# Altium PCB RT_SUPER_C1.PCBdoc (part 1 of 3)
Units mil, origin at the board's own origin, x right, y up, seen from the top; angles counter-clockwise.
Board outline 1450 x 1450 mil, 6 copper layers (Top Layer, GND2, PWR3, PWR4, GND5, Bottom Layer), stack 39.512 mil thick; 158 components, 116 nets, 476 pads, 207 vias.
Unrouted connection lines stored in the file: 5.
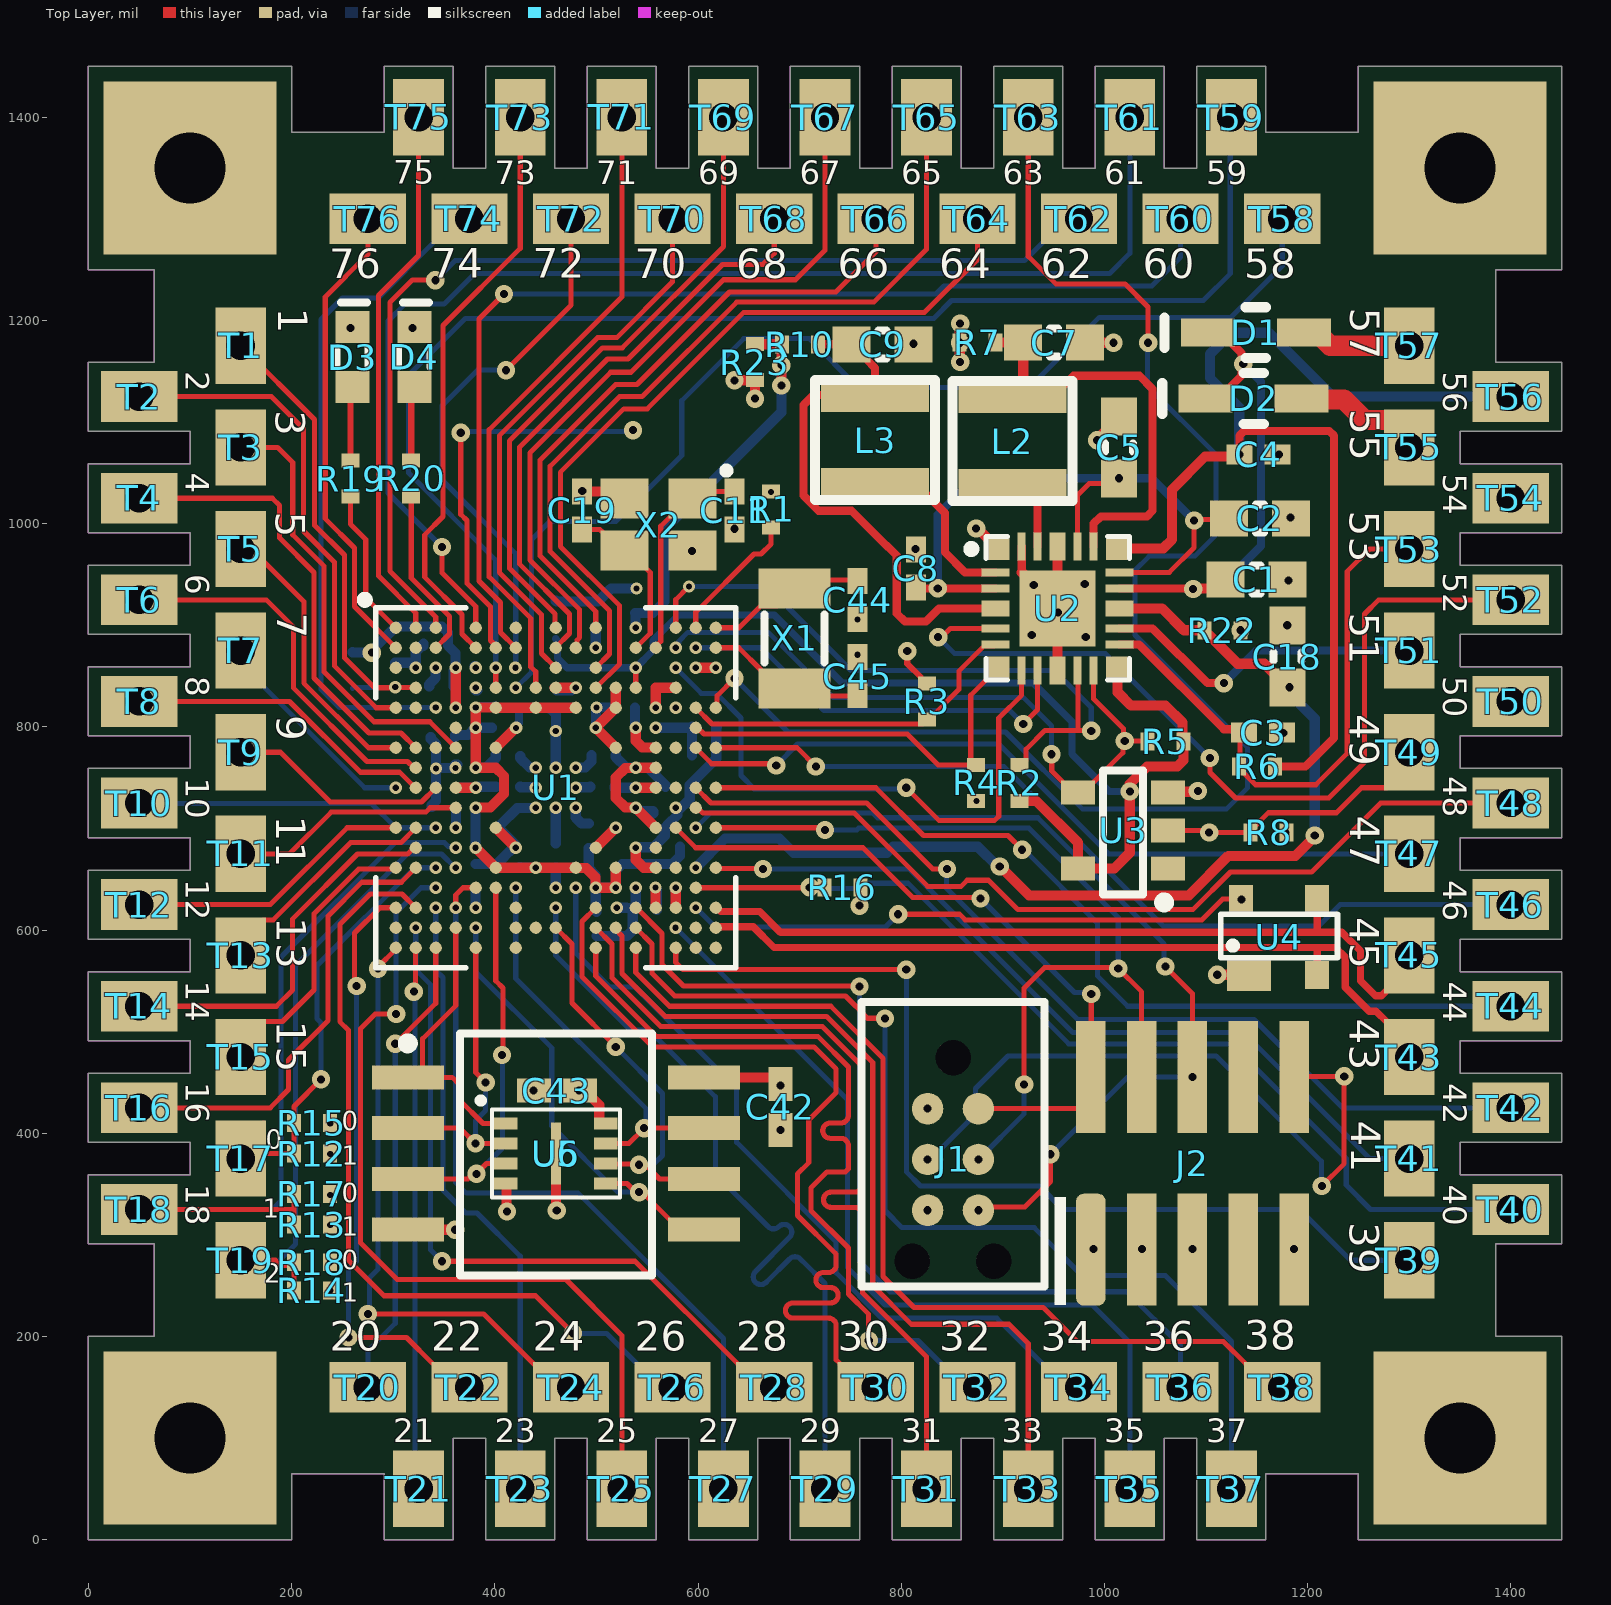
[diagram p0: Top Layer view]
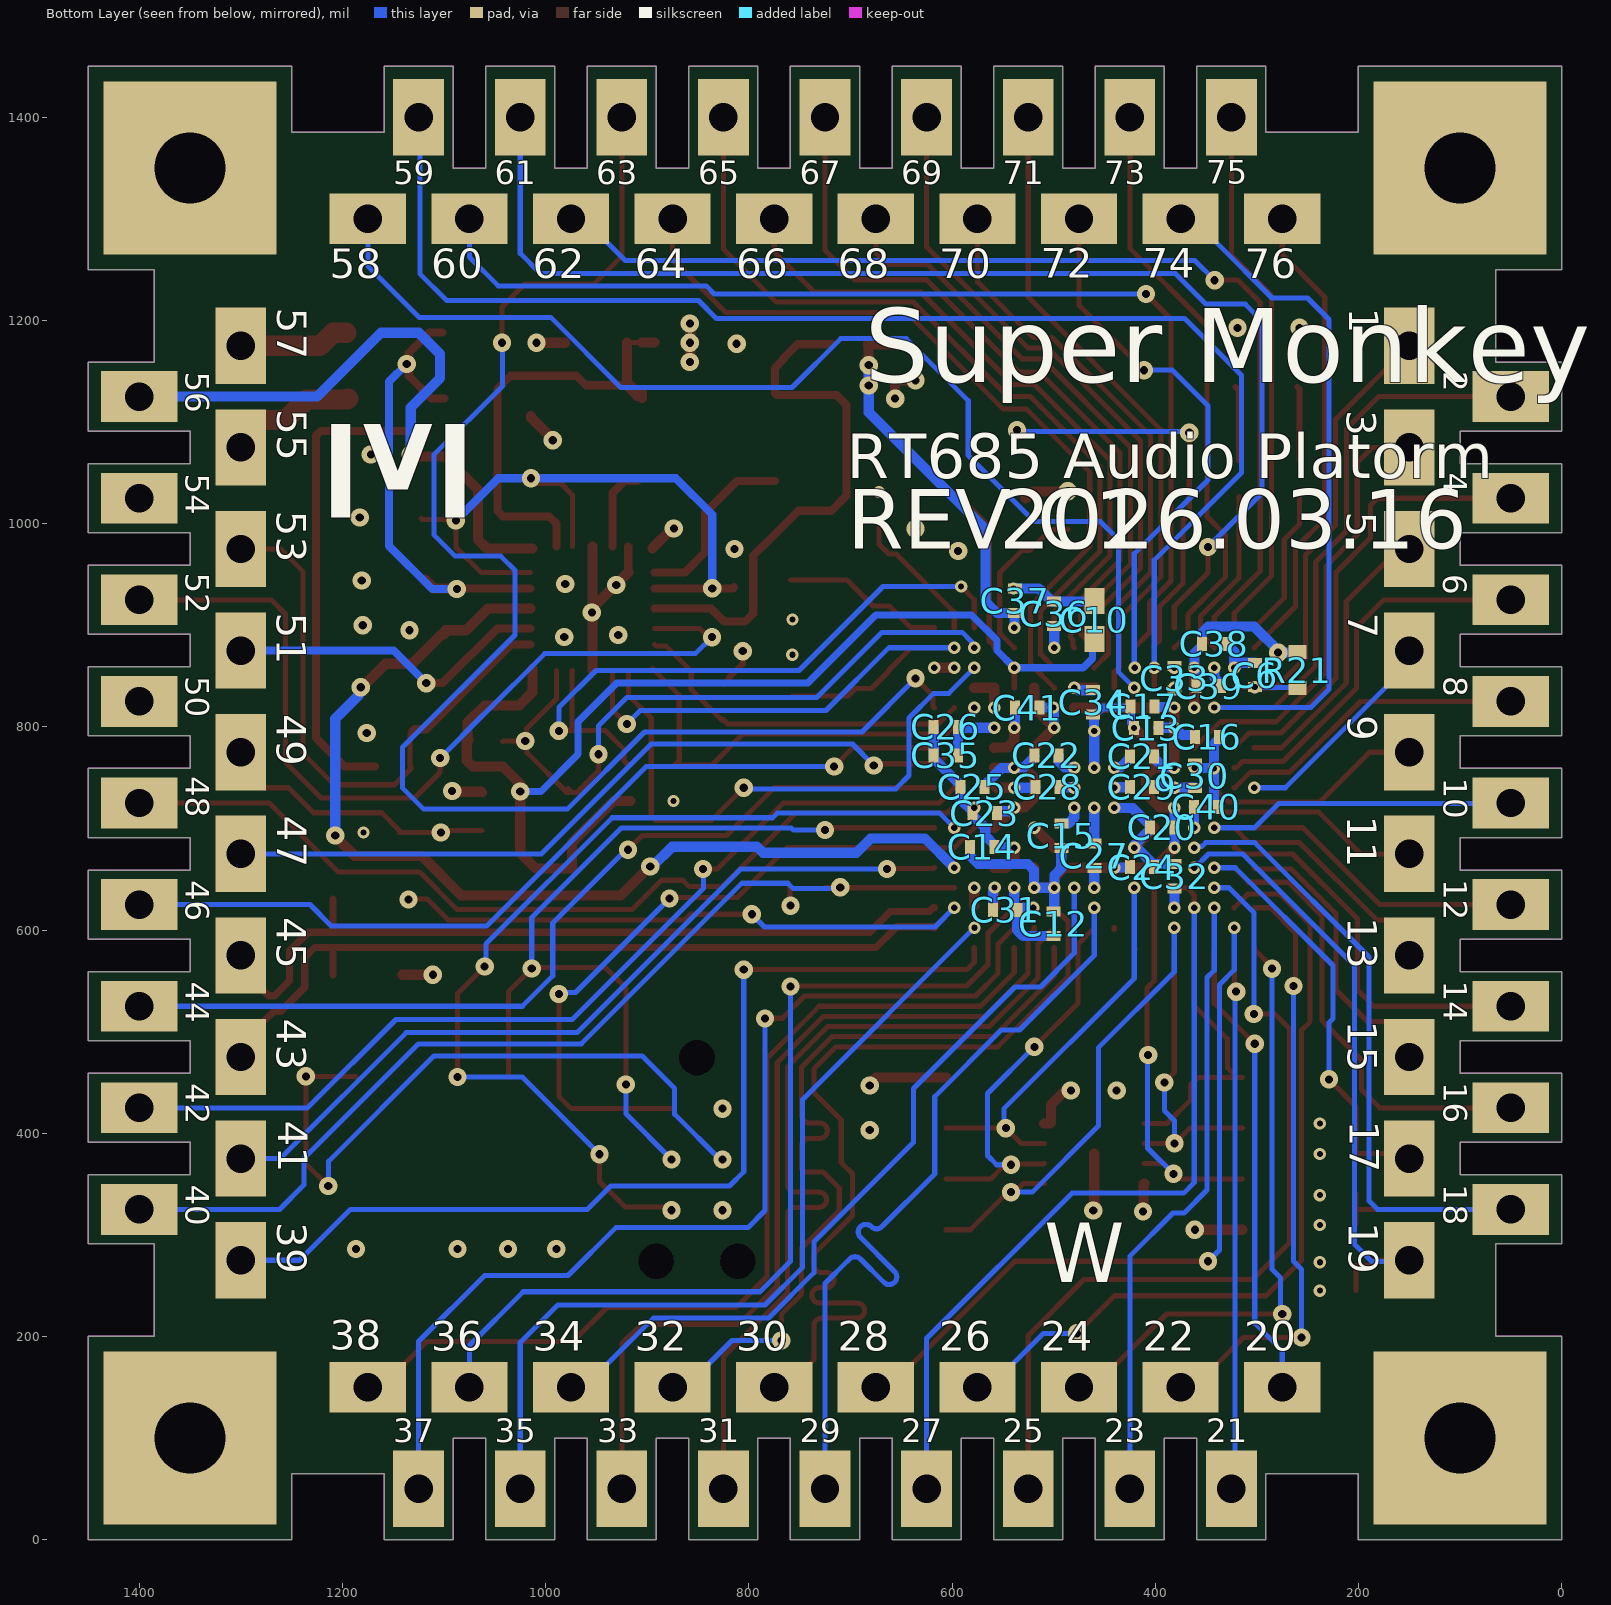
[diagram p1: Bottom Layer view, seen from below]
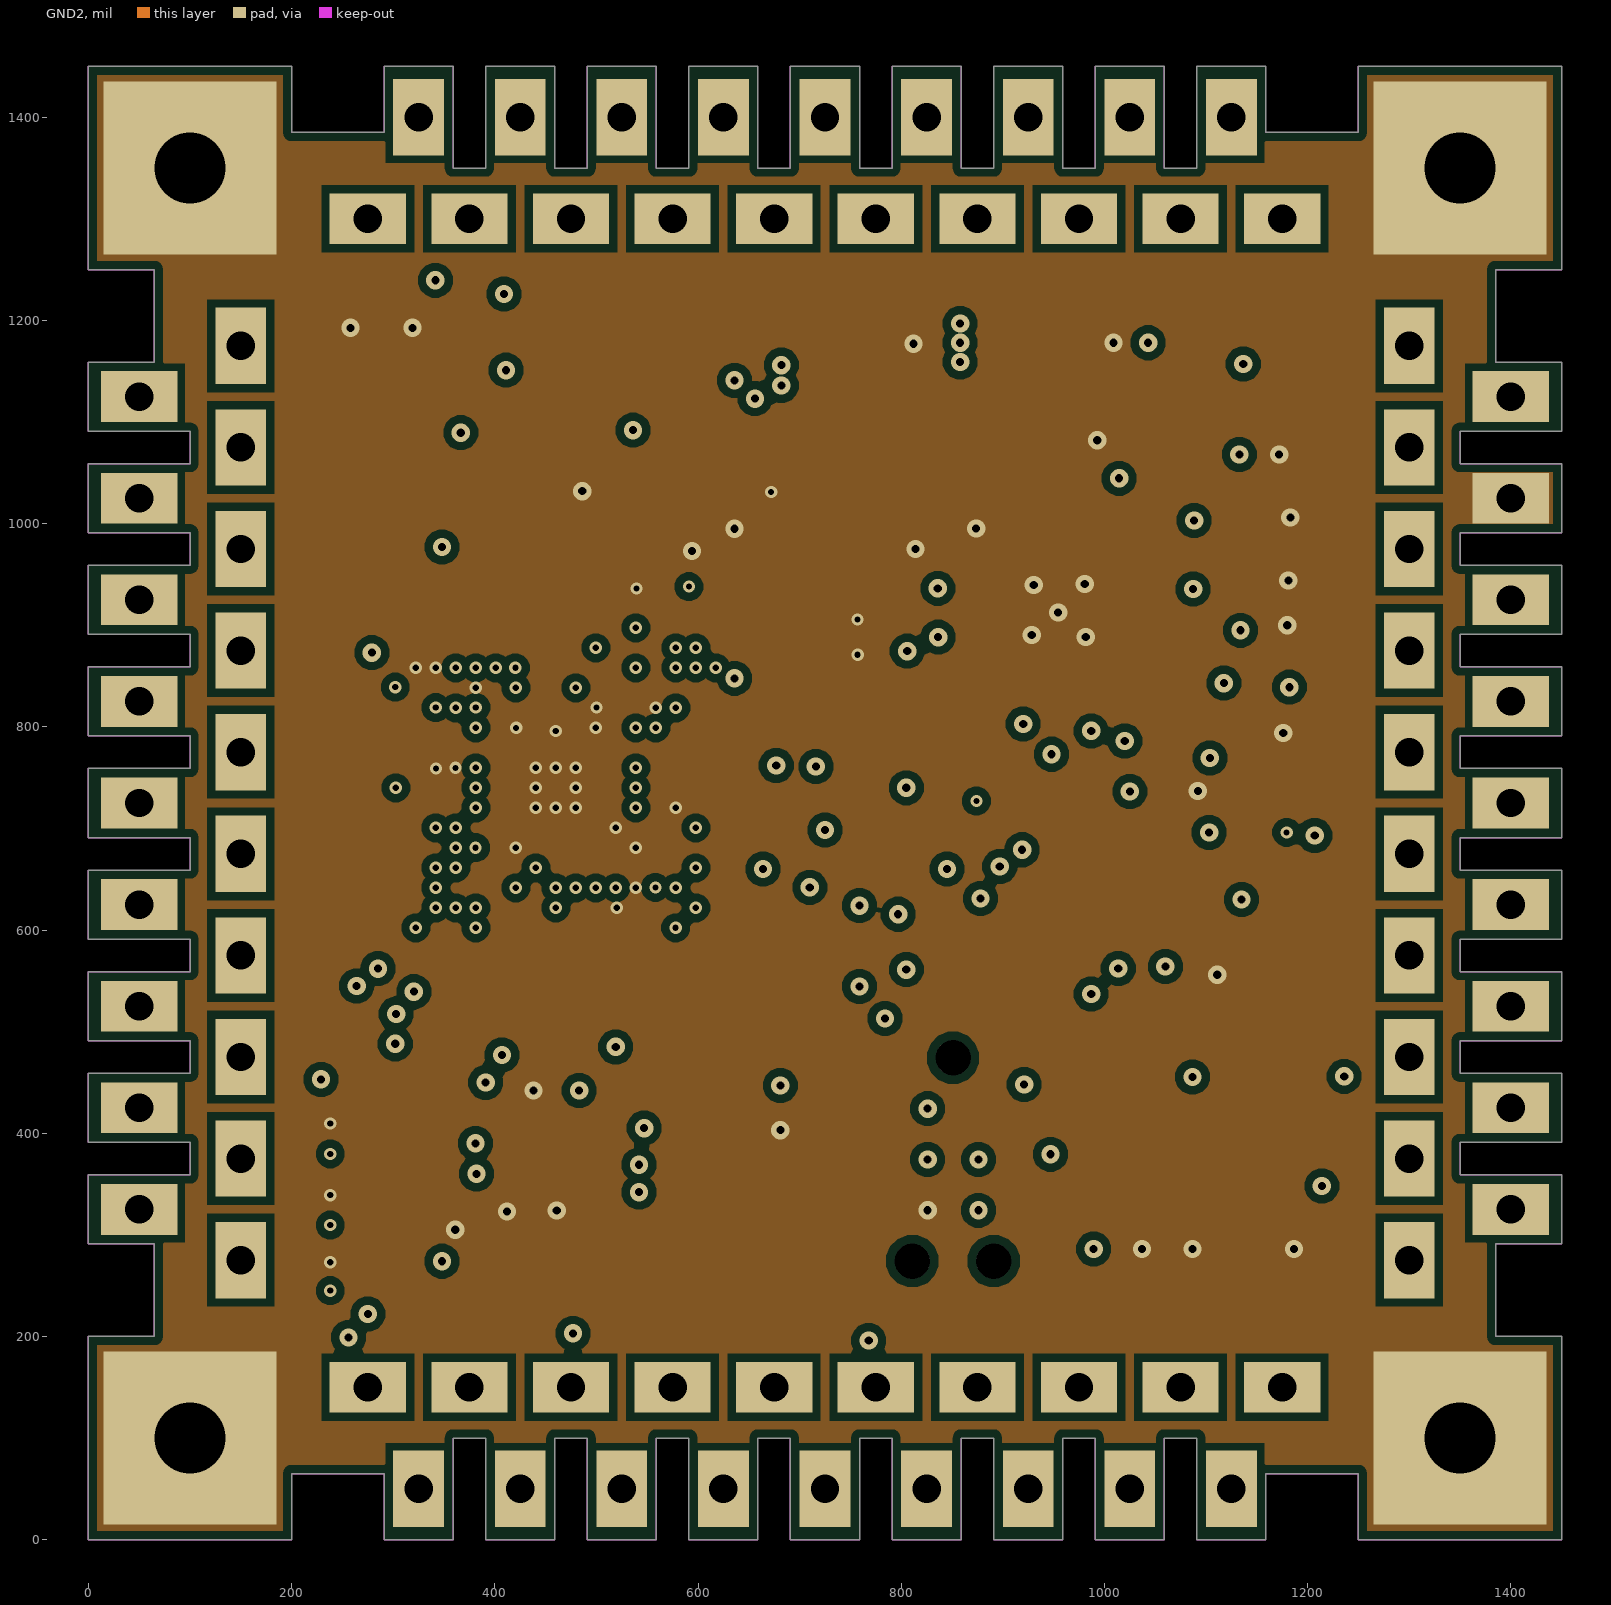
[diagram p2: GND2]
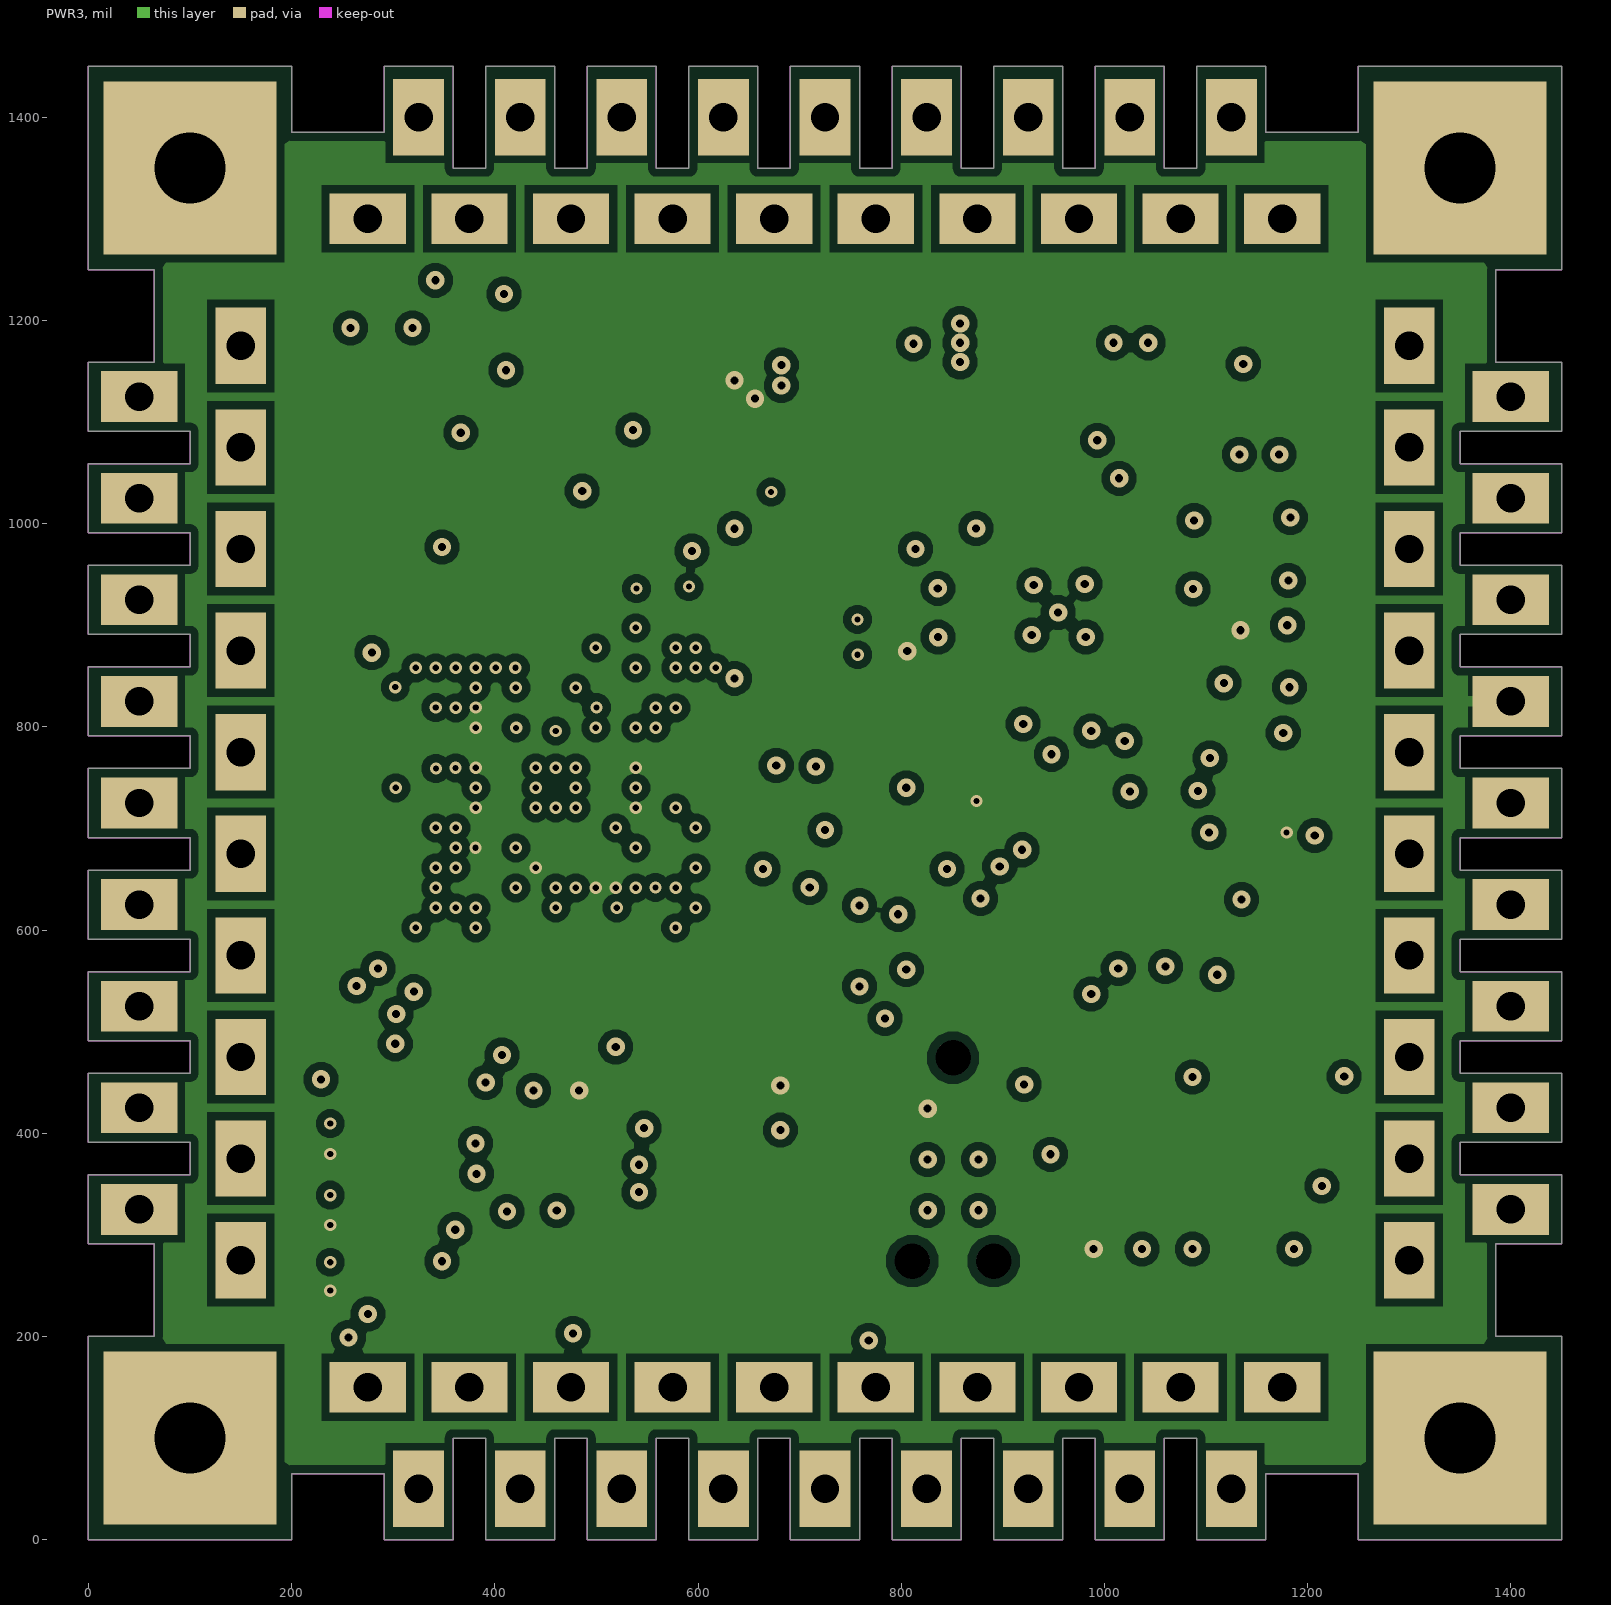
[diagram p3: PWR3]
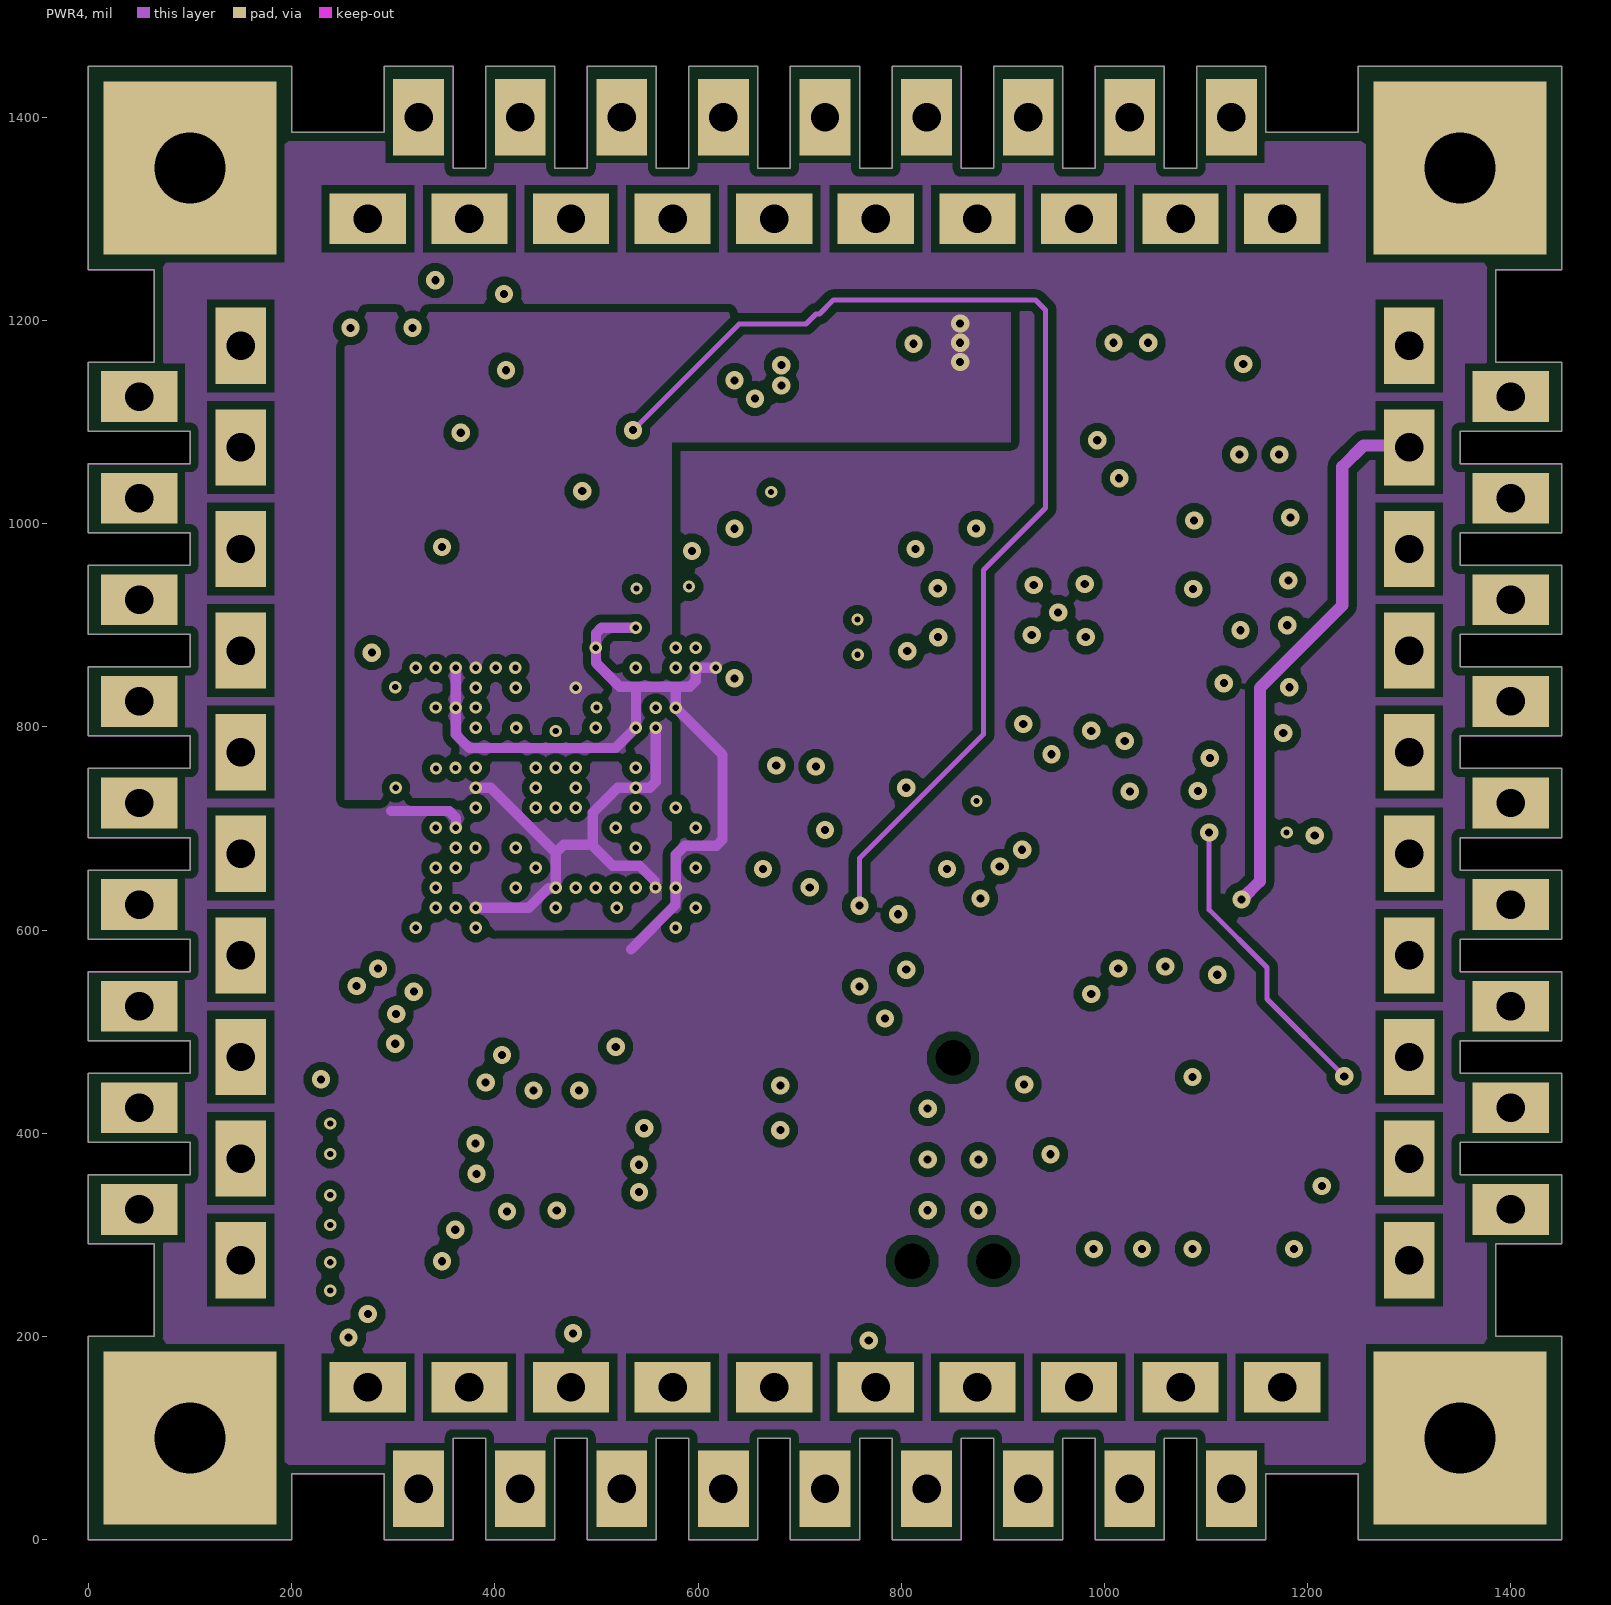
[diagram p4: PWR4]
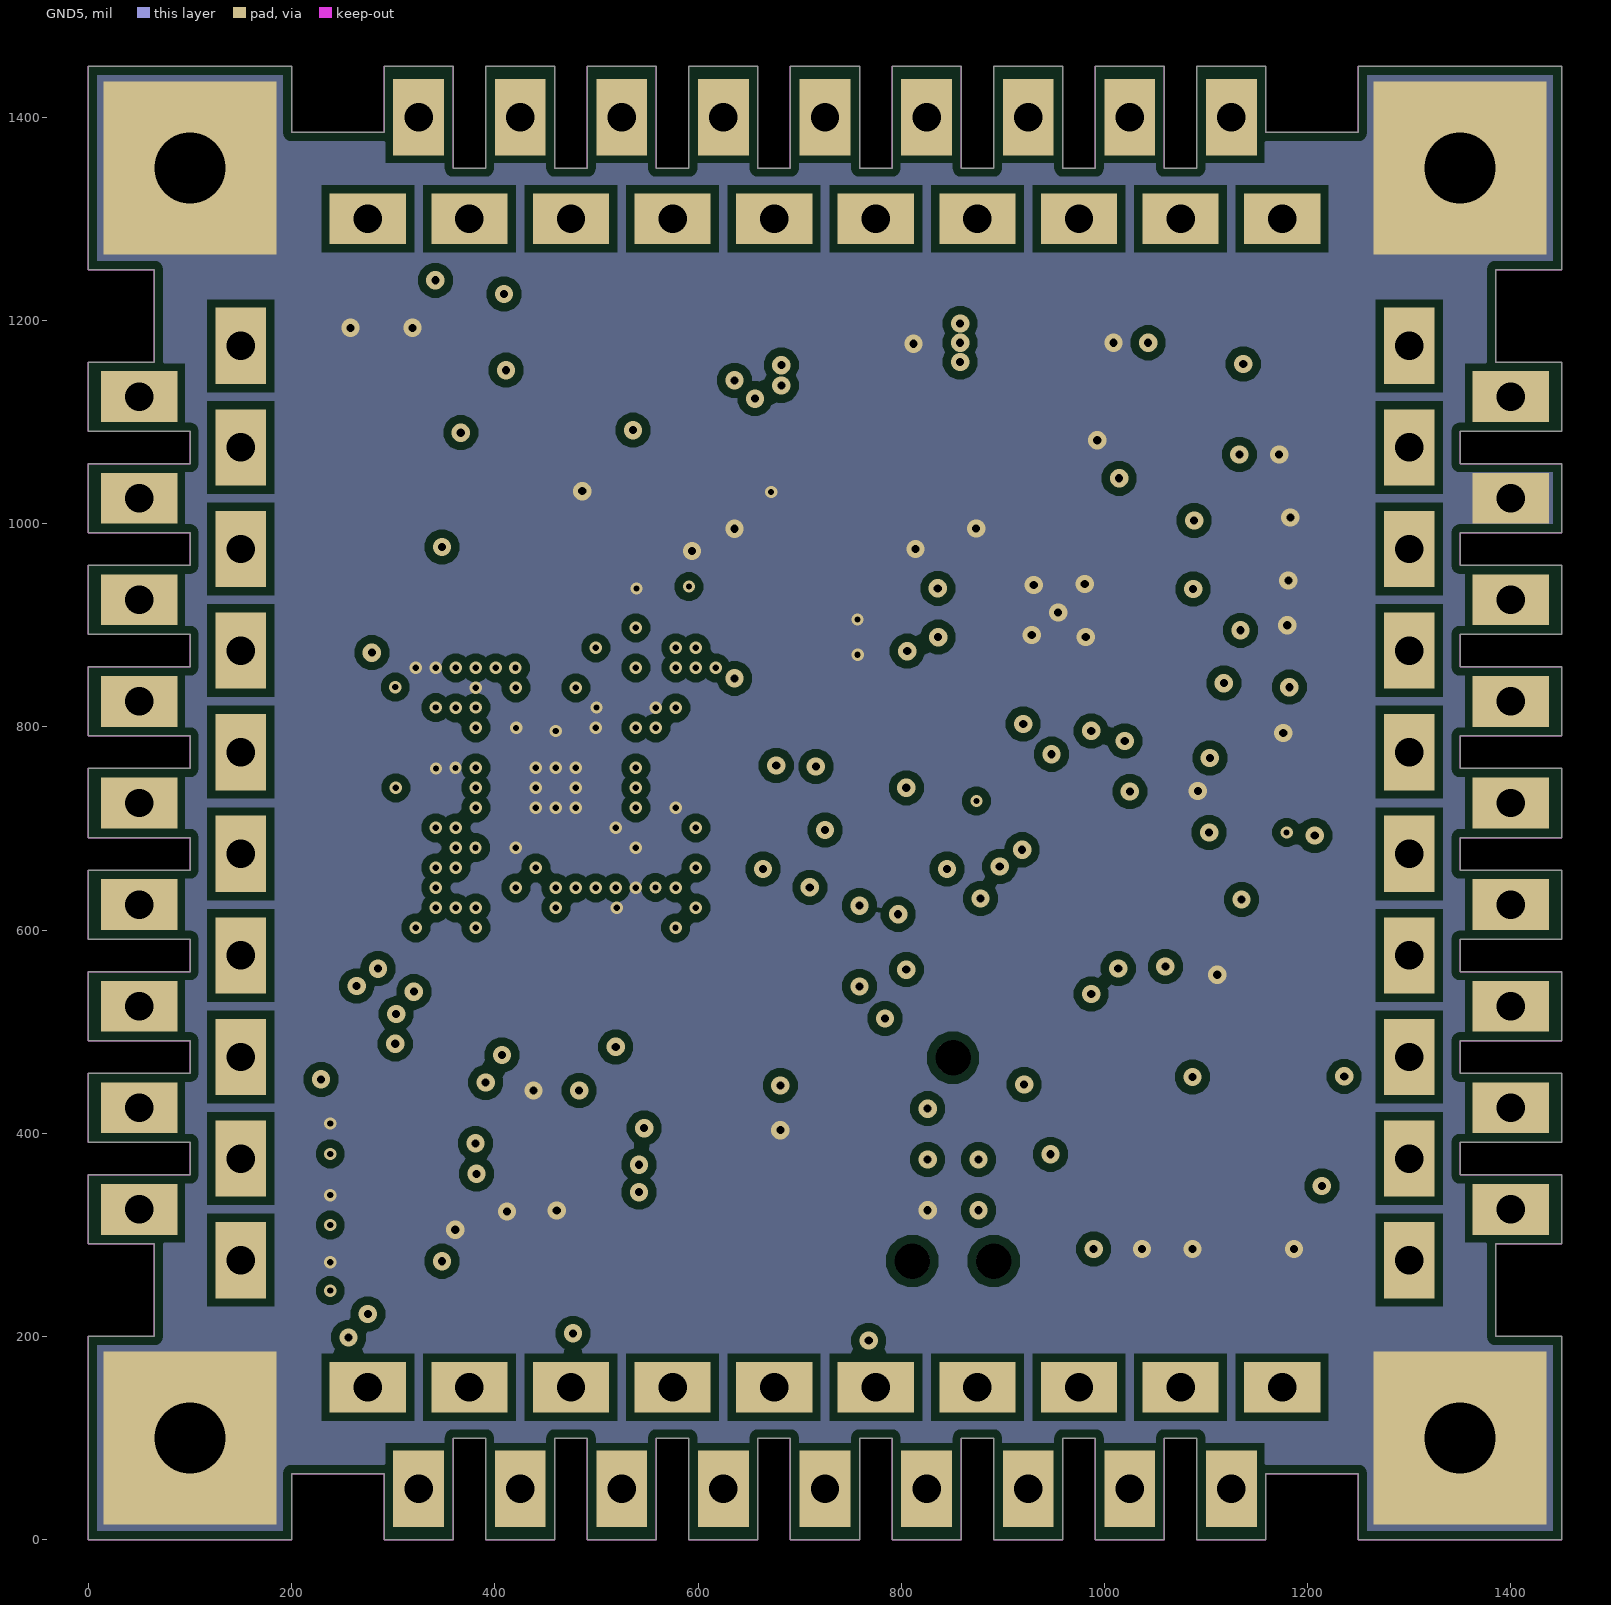
[diagram p5: GND5]
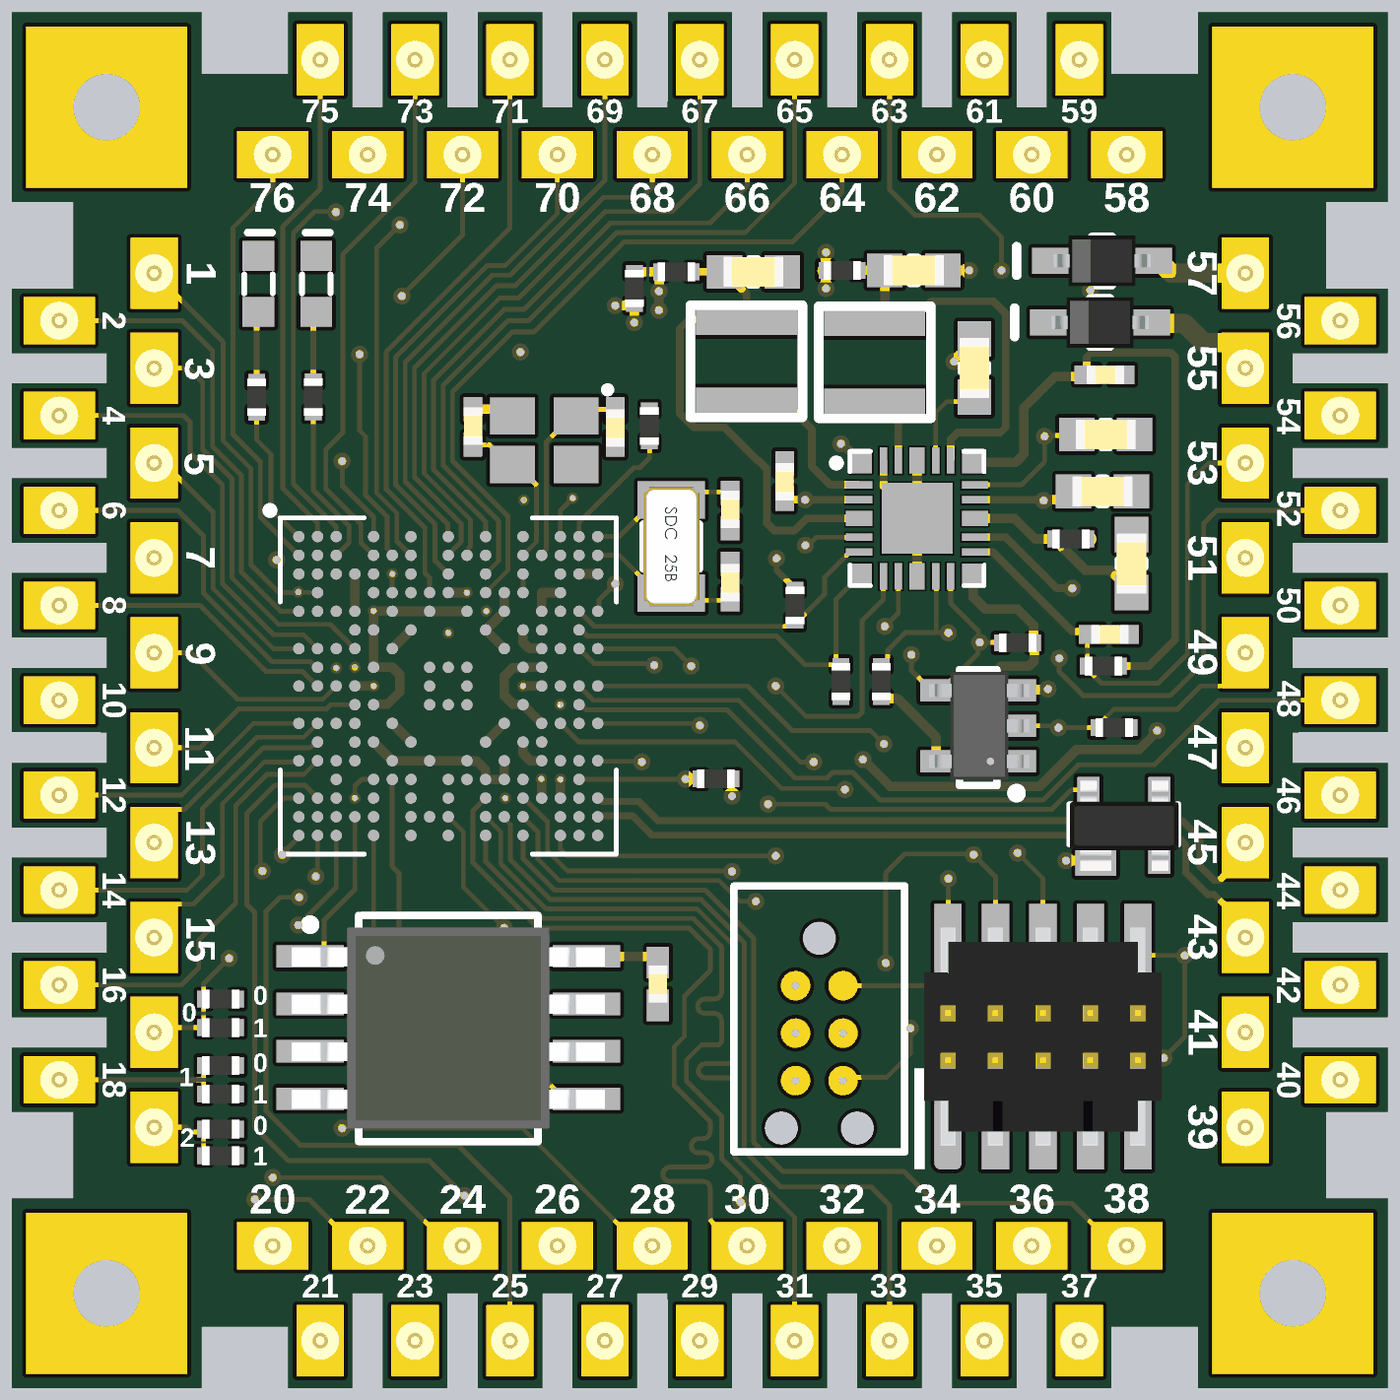
[diagram p7: 3D render of the assembled board from above, using the file's embedded part models]
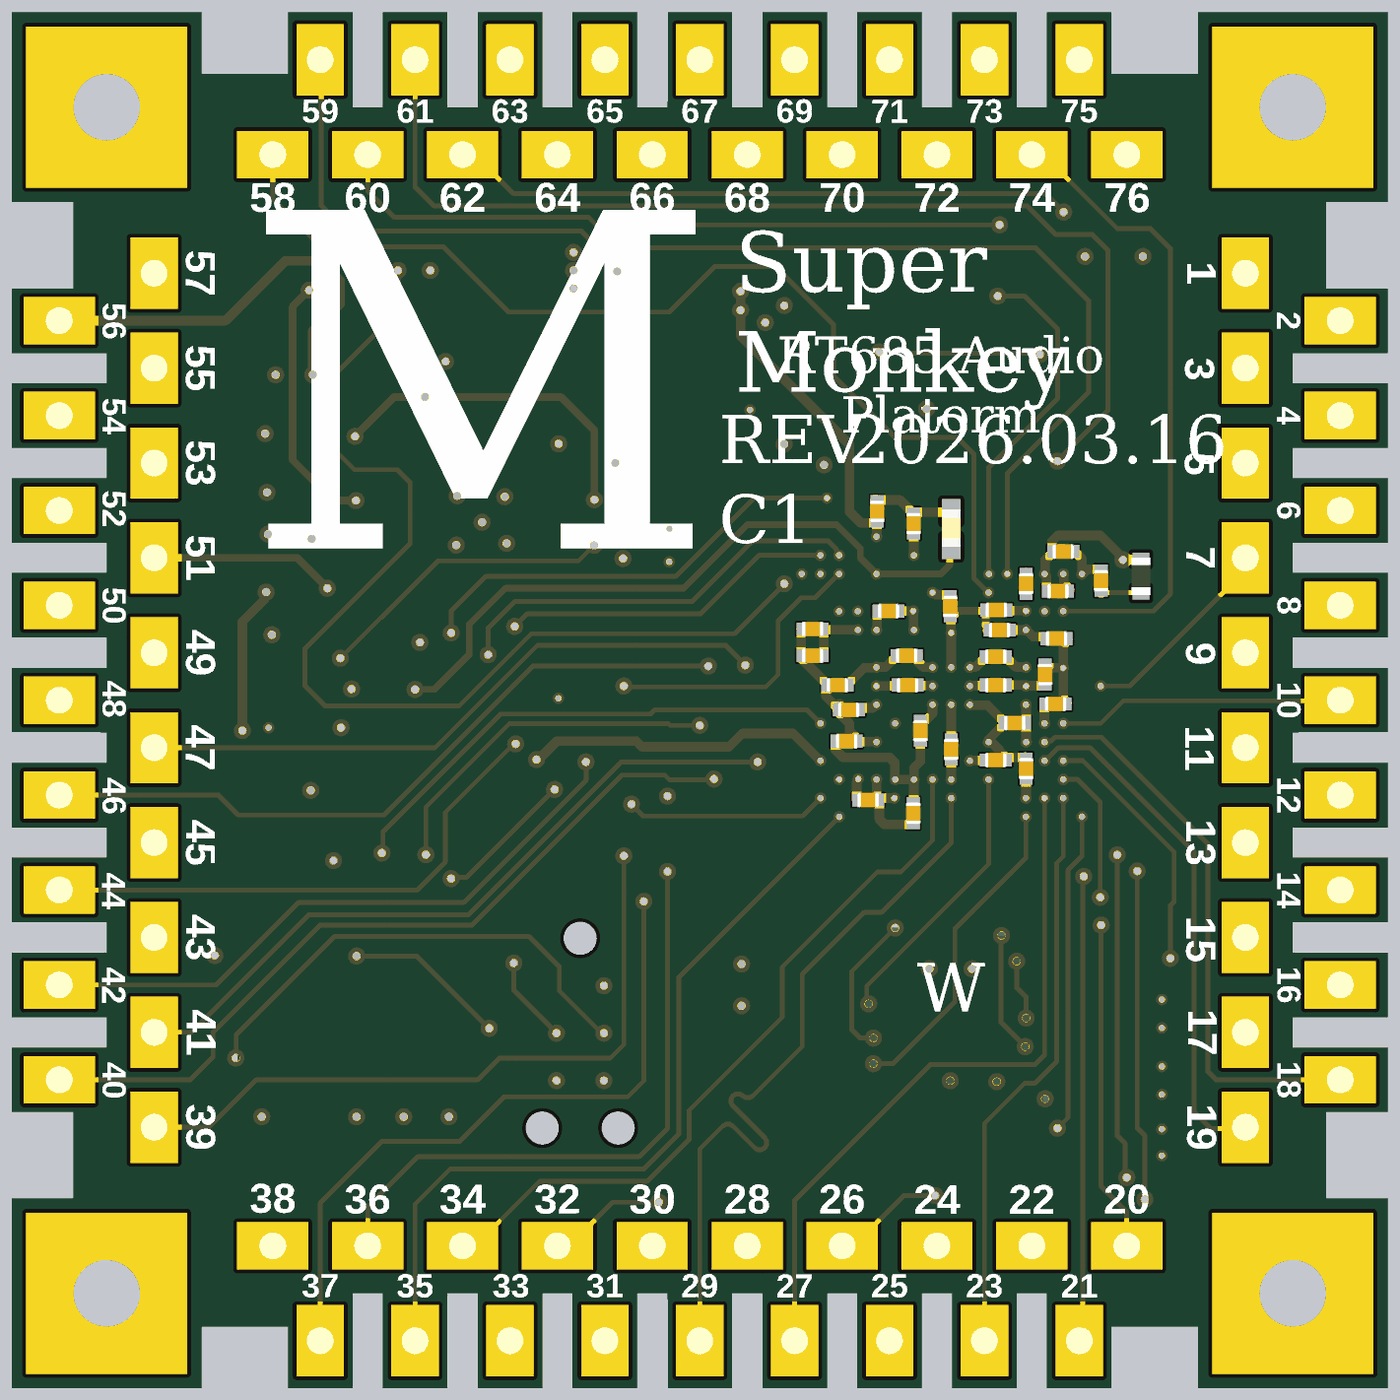
[diagram p8: 3D render of the assembled board from below, using the file's embedded part models]

## Layer stack, top to bottom
Top Solder: solder mask 0.4, Solder Resist, Dk 3.5
Top Layer: signal copper 1.4
Dielectric 3: prepreg 2.8, PP-006, Dk 4.1
GND2: signal copper 1.378
Dielectric 1: prepreg 2.8, PP-006, Dk 4.1
PWR3: signal copper 1.378
Dielectric1: dielectric 20, FR-4, Dk 4.8
PWR4: signal copper 1.378
Dielectric 2: prepreg 2.8, PP-006, Dk 4.1
GND5: signal copper 1.378
Dielectric 4: prepreg 2.8, PP-006, Dk 4.1
Bottom Layer: signal copper 1.4
Bottom Solder: solder mask 0.4, Solder Resist, Dk 3.5

## Board outline
0,0 0,200 65,200 65,291 0,291 0,359 100,359 100,391 0,391 0,459 100,459 100,491 0,491 0,559 100,559 100,591 0,591 0,659 100,659 100,691 0,691 0,759 100,759 100,791 0,791 0,859 100,859 100,891 0,891 0,959 100,959 100,991 0,991 0,1059 100,1059 100,1091 0,1091 0,1159 65,1159 65,1250 0,1250 0,1450 200,1450 200,1385 291,1385 291,1450 359,1450 359,1350 391,1350 391,1450 459,1450 459,1350 491,1350 491,1450 559,1450 559,1350 591,1350 591,1450 659,1450 659,1350 691,1350 691,1450 759,1450 759,1350 791,1350 791,1450 859,1450 859,1350 891,1350 891,1450 959,1450 959,1350 991,1350 991,1450 1059,1450 1059,1350 1091,1350 1091,1450 1159,1450 1159,1385 1250,1385 1250,1450 1450,1450 1450,1250 1385,1250 1385,1159 1450,1159 1450,1091 1350,1091 1350,1059 1450,1059 1450,991 1350,991 1350,959 1450,959 1450,891 1350,891 1350,859 1450,859 1450,791 1350,791 1350,759 1450,759 1450,691 1350,691 1350,659 1450,659 1450,591 1350,591 1350,559 1450,559 1450,491 1350,491 1350,459 1450,459 1450,391 1350,391 1350,359 1450,359 1450,291 1385,291 1385,200 1450,200 1450,0 1250,0 1250,65 1159,65 1159,0 1091,0 1091,100 1059,100 1059,0 991,0 991,100 959,100 959,0 891,0 891,100 859,100 859,0 791,0 791,100 759,100 759,0 691,0 691,100 659,100 659,0 591,0 591,100 559,100 559,0 491,0 491,100 459,100 459,0 391,0 391,100 359,100 359,0 291,0 291,65 200,65 200,0

## Design rules (kind name [scope] priority, off if disabled: settings)
Clearance [All] p1: gap=5 ignorepadtopadclearanceinfootprint=FALSE except(8: Arc-Poly Track-Poly SMDPad-Poly THPad-Poly Via-Poly Fill-Poly Poly-Poly)
ComponentClearance [All] p1: gap=5 collisioncheckmode=3 verticalgap=5 showdistances=FALSE
DiffPairsRouting [All] p1: maxlimit=8 minlimit=8 mostfreqgap=8 toplayer_minwidth=7.15 toplayer_maxwidth=7.15 toplayer_prefwidth=7.15 midlayer1_minwidth=7.15 midlayer1_maxwidth=7.15 midlayer1_prefwidth=7.15 midlayer2_minwidth=7.15 midlayer2_maxwidth=7.15 midlayer2_prefwidth=7.15 midlayer3_minwidth=7.15 midlayer3_maxwidth=7.15 midlayer3_prefwidth=7.15 midlayer4_minwidth=7.15 midlayer4_maxwidth=7.15 midlayer4_prefwidth=7.15 bottomlayer_minwidth=7.15 bottomlayer_maxwidth=7.15 bottomlayer_prefwidth=7.15 maxuncoupledlength=500
MatchedLengths EMMC_MATCH [InNetClass('SDIO')] p1: tolerance=50 checknetsindiffpair=FALSE checkdiffpairvsdiffpair=TRUE checkxsignals=TRUE checkothers=TRUE
PlaneClearance [All] p1: clearance=10
PolygonConnect PolygonConnect_2 [InNet('GND')] p1: thpad.connectstyle=Direct thpad.reliefconductorwidth=10 thpad.reliefentries=4 thpad.polygonreliefangle="90 Angle" thpad.airgapwidth=10 smdpad.connectstyle=Relief smdpad.reliefconductorwidth=10 smdpad.reliefentries=4 smdpad.polygonreliefangle="90 Angle" smdpad.airgapwidth=10 via.connectstyle=Direct via.reliefconductorwidth=10 via.reliefentries=4 via.polygonreliefangle="90 Angle" via.airgapwidth=10
PolygonConnect PolygonConnect_1 [IsVia] p2: connectstyle=Direct reliefconductorwidth=10 reliefentries=4 polygonreliefangle="90 Angle" airgapwidth=10
PolygonConnect [All] p3: connectstyle=Relief reliefconductorwidth=10 reliefentries=4 polygonreliefangle="90 Angle" airgapwidth=5
RoutingVias [All] p1: holewidth=12 width=26 viastyle="Through Hole" minholewidth=6 minwidth=6 maxholewidth=50 maxwidth=75
SilkToSolderMaskClearance SilkscreenOverComponentPads [IsPad] p1: minsilkscreentomaskgap=10 clearancetoexposedcopper=TRUE
SolderMaskExpansion [All] p1: expansion=4 istentingtop=FALSE
SupplyNets "Schematic Supply Nets" [InNet('+1v8-AO')] p1: voltage=0.000
SupplyNets "Schematic Supply Nets_11" [InNet('VDD-CORE')] p2: voltage=0.000
SupplyNets "Schematic Supply Nets_10" [InNet('+VIN')] p3: voltage=0.000
SupplyNets "Schematic Supply Nets_9" [InNet('+VDDIO')] p4: voltage=0.000
SupplyNets "Schematic Supply Nets_8" [InNet('+1v8')] p5: voltage=0.000
SupplyNets "Schematic Supply Nets_7" [InNet('+3v3')] p6: voltage=0.000
SupplyNets "Schematic Supply Nets_6" [InNet('+VREF')] p7: voltage=0.000
SupplyNets "Schematic Supply Nets_5" [InNet('+VBATT_BU')] p8: voltage=0.000
SupplyNets "Schematic Supply Nets_4" [InNet('+VBATT')] p9: voltage=0.000
SupplyNets "Schematic Supply Nets_2" [InNet('GND')] p10: voltage=0.000
SupplyNets "Schematic Supply Nets_1" [InNet('+5vUSB')] p11: voltage=0.000
Width [All] p1: maxlimit=200 minlimit=5 preferedwidth=5
26 further rules are at their usual default settings.

## Classes and differential pairs
net class 90-OHM: USB_D_N USB_D_P
net class SDIO: SD-CLK SD-CMD SD-D0 SD-D1 SD-D2 SD-D3
differential pair USB_D: +USB_D_P -USB_D_N

## Components (designator, comment, footprint, x,y, rotation, side; value= is the part's Value field where it differs from the comment)
C1 "2.2µF" C0603_0.90MM_MD 1149.48,945.11 r180 top
C2 "4.7µF" C0603_1.00MM_MD 1152.89,1005.11 r0 top
C3 "0.47µF" C0402_0.55MM_HD 1156.22,794.35 r180 top
C4 "1µF" C0402_0.55MM_HD 1151.48,1068.11 r180 top
C5 "2.2µF" C0603_0.90MM_MD 1014.48,1075.11 r90 top
C6 "0.1uF 6v" C0201_PERFECT 302,851 r270 bottom
C7 "10µF" C0603_0.90MM_MD 950.58,1178.11 r180 top
C8 "1µF" C0402_0.55MM_HD 814.47,956.06 r90 top
C9 "10µF" C0603_0.90MM_MD 781.53,1176.53 r180 top
C10 "1µF" C0402_0.55MM_HD 460,905.35 r270 bottom
C11 "8pF" C0402_0.55MM_HD 636,1013 r90 top
C12 "0.1uF 6v" C0201_PERFECT 500,606 r90 bottom
C13 "0.1uF 6v" C0201_PERFECT 409,799 r180 bottom
C14 "0.1uF 6v" C0201_PERFECT 570.24,681.93 r0 bottom
C15 "0.1uF 6v" C0201_PERFECT 492.48,692.76 r270 bottom
C16 "0.1uF 6v" C0201_PERFECT 349,790 r0 bottom
C17 "0.1uF 6v" C0201_PERFECT 412.49,820.12 r180 bottom
C18 "2.2µF" C0603_0.90MM_MD 1180,869 r270 top
C19 "8pF" C0402_0.55MM_HD 486,1013 r270 top
C20 "0.1uF 6v" C0201_PERFECT 393,701 r180 bottom
C21 "0.1uF 6v" C0201_PERFECT 413,771 r180 bottom
C22 "0.1uF 6v" C0201_PERFECT 507,772 r0 bottom
C23 "0.1uF 6v" C0201_PERFECT 567.88,715 r180 bottom
C24 "0.1uF 6v" C0201_PERFECT 413,662 r0 bottom
C25 "0.1uF 6v" C0201_PERFECT 579.88,741 r180 bottom
C26 "0.1uF 6v" C0201_PERFECT 606,800 r180 bottom
C27 "0.1uF 6v" C0201_PERFECT 460,673.26 r270 bottom
C28 "0.1uF 6v" C0201_PERFECT 506,741 r0 bottom
C29 "0.1uF 6v" C0201_PERFECT 413,741 r180 bottom
C30 "0.1uF 6v" C0201_PERFECT 361.08,752 r270 bottom
C31 "0.1uF 6v" C0201_PERFECT 547.6,619.92 r0 bottom
C32 "0.1uF 6v" C0201_PERFECT 381,653 r270 bottom
C33 "0.1uF 6v" C0201_PERFECT 380.99,847.71 r90 bottom
C34 "0.1uF 6v" C0201_PERFECT 461,824 r90 bottom
C35 "0.1uF 6v" C0201_PERFECT 606,772 r180 bottom
C36 "0.1uF 6v" C0201_PERFECT 499.57,911.18 r270 bottom
C37 "0.1uF 6v" C0201_PERFECT 538,924.06 r270 bottom
C38 "0.1uF 6v" C0201_PERFECT 341.89,881.73 r0 bottom
C39 "0.1uF 6v" C0201_PERFECT 347.41,840 r0 bottom
C40 "0.1uF 6v" C0201_PERFECT 350,721.16 r0 bottom
C41 "0.1uF 6v" C0201_PERFECT 526,819 r0 bottom
C42 "0.1µF" C0402_0.55MM_MD 681,426 r270 top
C43 "0.1µF" C0402_0.55MM_MD 461,442 r180 top
C44 "8pF" C0402_0.55MM_HD 757,925 r270 top
C45 "8pF" C0402_0.55MM_HD 757,850 r90 top
D1 "BAT760-7" D_SOD-323_P 1149,1188 r180 top
D2 "BAT760-7" D_SOD-323_P 1146.88,1123.21 r180 top
D3 "LED 1.6X0.8MM 570NM GRN CLR SMD" "LED_0603 - GREEN" 259.93,1163.82 r90 top
D4 "LED 1.6X0.8MM 630NM RED CLR SMD" "LED_0603 - RED" 320.87,1163.82 r90 top
J1 "TC2030‐CTL‐NL" "TC2030 NO LATCH" 851,374.15 r270 top
J2 "FTSH-105-01-L-DV-K-TR" FTSH-105-01-L-DV-K-TR 1086.67,370.42 r0 top
L2 "2.2µH 1.5A" L_NRH3012 909.48,1081.17 r90 top
L3 "2.2µH 1.5A" L_NRH3012 774.2,1082.17 r90 top
R1 "10k" R0402_0.40MM_HD 672,1014 r270 top
R2 "20k" R0402_0.40MM_HD 916.38,744.73 r270 top
R3 "2.2k" R0402_0.40MM_HD 825.31,825 r90 top
R4 "2.2k" R0402_0.40MM_HD 873.74,744.73 r270 top
R5 "20k" R0402_0.40MM_HD 1059.96,785.41 r0 top
R6 "0" R0402_0.40MM_HD 1150.32,761.01 r0 top
R7 "0" R0402_0.40MM_HD 875,1178.11 r180 top
R8 "100k" R0402_0.40MM_HD 1161.67,696.05 r0 top
R10 "0" R0402_0.40MM_HD 700.34,1176.53 r180 top
R12 "100k" R0402_0.40MM_HD 220,380 r0 top
R13 "100k" R0402_0.40MM_HD 220,310 r0 top
R14 "100k" R0402_0.40MM_HD 220,245 r0 top
R15 "100k" R0402_0.40MM_HD 220,410 r180 top
R16 "1k" R0402_0.40MM_HD 742,642 r180 top
R17 "100k" R0402_0.40MM_HD 220,340 r180 top
R18 "100k" R0402_0.40MM_HD 220,273 r180 top
R19 "1k" R0402_0.40MM_HD 258,1044.28 r270 top
R20 "1k" R0402_0.40MM_HD 317.73,1044.6 r270 top
R21 "0" R0402_0.40MM_HD 260,855.72 r270 bottom
R22 "0" R0402_0.40MM_HD 1116,895 r0 top
R23 "0" R0402_0.40MM_HD 656,1159 r270 top
T1 "SOLDER_HOLE" MACHINE_PIN_SOLDERHOLE#1 150,1175 r180 top locked
T2 "SOLDER_HOLE" MACHINE_PIN_SOLDERHOLE#2 50,1125 r180 top locked
T3 "SOLDER_HOLE" MACHINE_PIN_SOLDERHOLE#1 150,1075 r180 top locked
T4 "SOLDER_HOLE" MACHINE_PIN_SOLDERHOLE#2 50,1025 r180 top locked
T5 "SOLDER_HOLE" MACHINE_PIN_SOLDERHOLE#1 150,975 r180 top
T6 "SOLDER_HOLE" MACHINE_PIN_SOLDERHOLE#2 50,925 r180 top locked
T7 "SOLDER_HOLE" MACHINE_PIN_SOLDERHOLE#1 150,875 r180 top locked
T8 "SOLDER_HOLE" MACHINE_PIN_SOLDERHOLE#2 50,825 r180 top locked
T9 "SOLDER_HOLE" MACHINE_PIN_SOLDERHOLE#1 150,775 r180 top locked
T10 "SOLDER_HOLE" MACHINE_PIN_SOLDERHOLE#2 50,725 r180 top locked
T11 "SOLDER_HOLE" MACHINE_PIN_SOLDERHOLE#1 150,675 r180 top locked
T12 "SOLDER_HOLE" MACHINE_PIN_SOLDERHOLE#2 50,625 r180 top locked
T13 "SOLDER_HOLE" MACHINE_PIN_SOLDERHOLE#1 150,575 r180 top locked
T14 "SOLDER_HOLE" MACHINE_PIN_SOLDERHOLE#2 50,525 r180 top locked
T15 "SOLDER_HOLE" MACHINE_PIN_SOLDERHOLE#1 150,475 r180 top locked
T16 "SOLDER_HOLE" MACHINE_PIN_SOLDERHOLE#2 50,425 r180 top locked
T17 "SOLDER_HOLE" MACHINE_PIN_SOLDERHOLE#1 150,375 r180 top locked
T18 "SOLDER_HOLE" MACHINE_PIN_SOLDERHOLE#2 50,325 r180 top locked
T19 "SOLDER_HOLE" MACHINE_PIN_SOLDERHOLE#1 150,275 r180 top locked
T20 "SOLDER_HOLE" MACHINE_PIN_SOLDERHOLE#2 275,150 r180 top locked
T21 "SOLDER_HOLE" MACHINE_PIN_SOLDERHOLE#1 325,50 r180 top locked
T22 "SOLDER_HOLE" MACHINE_PIN_SOLDERHOLE#2 375,150 r180 top locked
T23 "SOLDER_HOLE" MACHINE_PIN_SOLDERHOLE#1 425,50 r180 top locked
T24 "SOLDER_HOLE" MACHINE_PIN_SOLDERHOLE#2 475,150 r180 top locked
T25 "SOLDER_HOLE" MACHINE_PIN_SOLDERHOLE#1 525,50 r180 top locked
T26 "SOLDER_HOLE" MACHINE_PIN_SOLDERHOLE#2 575,150 r180 top locked
T27 "SOLDER_HOLE" MACHINE_PIN_SOLDERHOLE#1 625,50 r180 top locked
T28 "SOLDER_HOLE" MACHINE_PIN_SOLDERHOLE#2 675,150 r180 top locked
T29 "SOLDER_HOLE" MACHINE_PIN_SOLDERHOLE#1 725,50 r180 top locked
T30 "SOLDER_HOLE" MACHINE_PIN_SOLDERHOLE#2 775,150 r180 top locked
T31 "SOLDER_HOLE" MACHINE_PIN_SOLDERHOLE#1 825,50 r180 top locked
T32 "SOLDER_HOLE" MACHINE_PIN_SOLDERHOLE#2 875,150 r180 top locked
T33 "SOLDER_HOLE" MACHINE_PIN_SOLDERHOLE#1 925,50 r180 top locked
T34 "SOLDER_HOLE" MACHINE_PIN_SOLDERHOLE#2 975,150 r180 top locked
T35 "SOLDER_HOLE" MACHINE_PIN_SOLDERHOLE#1 1025,50 r180 top locked
T36 "SOLDER_HOLE" MACHINE_PIN_SOLDERHOLE#2 1075,150 r180 top locked
T37 "SOLDER_HOLE" MACHINE_PIN_SOLDERHOLE#1 1125,50 r180 top locked
T38 "SOLDER_HOLE" MACHINE_PIN_SOLDERHOLE#2 1175,150 r180 top locked
T39 "SOLDER_HOLE" MACHINE_PIN_SOLDERHOLE#1 1300,275 r180 top locked
T40 "SOLDER_HOLE" MACHINE_PIN_SOLDERHOLE#2 1400,325 r180 top locked
T41 "SOLDER_HOLE" MACHINE_PIN_SOLDERHOLE#1 1300,375 r180 top locked
T42 "SOLDER_HOLE" MACHINE_PIN_SOLDERHOLE#2 1400,425 r180 top locked
T43 "SOLDER_HOLE" MACHINE_PIN_SOLDERHOLE#1 1300,475 r180 top locked
T44 "SOLDER_HOLE" MACHINE_PIN_SOLDERHOLE#2 1400,525 r180 top locked
T45 "SOLDER_HOLE" MACHINE_PIN_SOLDERHOLE#1 1300,575 r180 top locked
T46 "SOLDER_HOLE" MACHINE_PIN_SOLDERHOLE#2 1400,625 r180 top locked
T47 "SOLDER_HOLE" MACHINE_PIN_SOLDERHOLE#1 1300,675 r180 top locked
T48 "SOLDER_HOLE" MACHINE_PIN_SOLDERHOLE#2 1400,725 r180 top locked
T49 "SOLDER_HOLE" MACHINE_PIN_SOLDERHOLE#1 1300,775 r180 top locked
T50 "SOLDER_HOLE" MACHINE_PIN_SOLDERHOLE#2 1400,825 r180 top locked
T51 "SOLDER_HOLE" MACHINE_PIN_SOLDERHOLE#1 1300,875 r180 top locked
T52 "SOLDER_HOLE" MACHINE_PIN_SOLDERHOLE#2 1400,925 r180 top locked
T53 "SOLDER_HOLE" MACHINE_PIN_SOLDERHOLE#1 1300,975 r180 top locked
T54 "SOLDER_HOLE" MACHINE_PIN_SOLDERHOLE#2 1400,1025 r180 top locked
T55 "SOLDER_HOLE" MACHINE_PIN_SOLDERHOLE#1 1300,1075 r180 top locked
T56 "SOLDER_HOLE" MACHINE_PIN_SOLDERHOLE#2 1400,1125 r180 top locked
T57 "SOLDER_HOLE" MACHINE_PIN_SOLDERHOLE#1 1300,1175 r180 top locked
T58 "SOLDER_HOLE" MACHINE_PIN_SOLDERHOLE#2 1175,1300 r180 top locked
T59 "SOLDER_HOLE" MACHINE_PIN_SOLDERHOLE#1 1125,1400 r180 top locked
T60 "SOLDER_HOLE" MACHINE_PIN_SOLDERHOLE#2 1075,1300 r180 top locked
T61 "SOLDER_HOLE" MACHINE_PIN_SOLDERHOLE#1 1025,1400 r180 top locked
T62 "SOLDER_HOLE" MACHINE_PIN_SOLDERHOLE#2 975,1300 r180 top locked
T63 "SOLDER_HOLE" MACHINE_PIN_SOLDERHOLE#1 925,1400 r180 top locked
T64 "SOLDER_HOLE" MACHINE_PIN_SOLDERHOLE#2 875,1300 r180 top locked
T65 "SOLDER_HOLE" MACHINE_PIN_SOLDERHOLE#1 825,1400 r180 top locked
T66 "SOLDER_HOLE" MACHINE_PIN_SOLDERHOLE#2 775,1300 r180 top locked
T67 "SOLDER_HOLE" MACHINE_PIN_SOLDERHOLE#1 725,1400 r180 top locked
T68 "SOLDER_HOLE" MACHINE_PIN_SOLDERHOLE#2 675,1300 r180 top locked
T69 "SOLDER_HOLE" MACHINE_PIN_SOLDERHOLE#1 625,1400 r180 top locked
T70 "SOLDER_HOLE" MACHINE_PIN_SOLDERHOLE#2 575,1300 r180 top locked
T71 "SOLDER_HOLE" MACHINE_PIN_SOLDERHOLE#1 525,1400 r180 top locked
T72 "SOLDER_HOLE" MACHINE_PIN_SOLDERHOLE#2 475,1300 r180 top locked
T73 "SOLDER_HOLE" MACHINE_PIN_SOLDERHOLE#1 425,1400 r180 top locked
T74 "SOLDER_HOLE" MACHINE_PIN_SOLDERHOLE#2 375,1300 r180 top locked
T75 "SOLDER_HOLE" MACHINE_PIN_SOLDERHOLE#1 325,1400 r180 top locked
T76 "SOLDER_HOLE" MACHINE_PIN_SOLDERHOLE#2 275,1300 r180 top locked
U1 "MIMXRT685SFVKB" VFBGA176 460,740 r0 top locked
U2 "PCA9420BSAZ" PCA9420 953.98,916.61 r0 top
U3 "SN74AUC1G07DBVR" SOT23-5 1018.43,698.02 r180 top
U4 "PRTR5V0U2X,215" SOT143B 1142.37,555.63 r0 top
U5 "W25Q16JWXHIQ" W25Q_XSON_8 460,380 r0 top locked
U6 "W25Q64JVSSIQ" SOIC127P830X200-8L 460,380 r0 top locked
X1 "32.768kHz" XTAL_3215 695,887 r270 top
X2 "24MHz" XTAL-2.5x2.0mm 561,999 r180 top

## Footprints (in the part's own frame and the unit in brackets; to place one, negate y for a bottom-side part, rotate by r counter-clockwise, add the part's x,y. Pads: shape width x height; smd on the part's side, far side on the other; paste and mask are expansions set on the pad)
C0201_PERFECT [mm] "Chip Capacitor, 2-Leads, Body 0.60x0.35mm, IPC High https://www.worthingtonassembly.com/blog/2018/1/29/the-perfect-0201-footprint"
  rect 0.25x0.35 smd mask+0.05: 1(-0.305,0) 2(0.305,0)
  body extent -0.3,-0.2 0.3,0.2, height 0.3
C0402_0.55MM_HD [mm] "Capacitor 0402 0.55mm Height- High Density"
  rect 0.65x0.5 smd: 1(-0.475,0) 2(0.475,0)
  body extent -0.53,-0.25 0.48,0.25, height 0.55
C0402_0.55MM_MD [mm] "Capacitor - 0402 - Medium Density"
  rect 0.85x0.6 smd: 1(-0.575,0) 2(0.575,0)
  body extent -0.5,-0.25 0.5,0.25, height 0.55
C0603_0.90MM_MD [mm] "Capacitor 0603 - Medium Density"
  rect 0.95x0.9 smd: 1(-0.775,0) 2(0.775,0)
  silkscreen extent -0.1,-0.35 0.1,0.35, body extent -0.8,-0.4 0.8,0.4, height 0.9
C0603_1.00MM_MD [mm] "Capacitor 0603 - Medium Density"
  rect 0.95x0.9 smd: 1(-0.775,0) 2(0.775,0)
  silkscreen extent -0.1,-0.35 0.1,0.35, body extent -0.8,-0.4 0.8,0.4, height 1
D_SOD-323_P [mm] "SOD-123 Diode - Polarized"
  rect 1.35x0.7 smd: 1(-1.2,0) 2(1.2,0)
  silkscreen extent -0.25,-0.64 2.29,0.64, body extent -1.3,-0.68 1.3,0.67, height 1.1
FTSH-105-01-L-DV-K-TR [mil] "Samtec FTSH-105-01-F-DV-K-A SMT Connector"
  rrect50% 29x110 smd: 1(-100,-85)
  rect 29x110 smd: 2(-100,85) 3(-50,-85) 4(-50,85) 5(0,-85) 6(0,85) 7(50,-85) 8(50,85) 9(100,-85) 10(100,85)
  silkscreen extent -136,-139 -125,-33, body extent -125,-115 125,115, height 242
L_NRH3012 [mm] "Inductor"
  rect 0.8x2.7 smd: 1(-1.1,0) 2(1.1,0)
  silkscreen extent -1.5,-1.5 1.5,1.5, body extent -1.5,-1.5 1.5,1.5, height 1.2
"LED_0603 - GREEN" [mm] "LED_0603 - GREEN"
  rect 0.8x0.85 smd: A(-0.75,0) C(0.75,0)
  silkscreen extent -0.25,-0.38 1.37,0.38, body extent -0.8,-0.4 0.8,0.4, height 0.75
"LED_0603 - RED" [mm] "LED_0603"
  rect 0.8x0.85 smd: A(-0.75,0) C(0.75,0)
  silkscreen extent -0.25,-0.38 1.37,0.38, body extent -0.8,-0.4 0.8,0.4, height 0.75
MACHINE_PIN_SOLDERHOLE#1 [mil]
  rect 50x75 hole 28: 1(0,0)
  body extent -20,-20 20,20, height 174
MACHINE_PIN_SOLDERHOLE#2 [mil]
  rect 75x50 hole 28: 1(0,0)
  body extent -20,-20 20,20, height 174
PCA9420 [mm]
  rect 0.7x0.2 smd mask+0.051: 1(-1.55,0.9) 2(-1.55,0.5) 4(-1.55,-0.5) 5(-1.55,-0.9) 13(1.55,-0.9) 14(1.55,-0.5) 16(1.55,0.5) 17(1.55,0.9)
  rect 0.7x0.4 smd mask+0.051: 3(-1.55,0) 15(1.55,0)
  rect 0.584x0.584 smd mask+0.051: 6(-1.5,-1.5) 12(1.5,-1.5) 18(1.5,1.5) 24(-1.5,1.5)
  rect 0.2x0.7 smd mask+0.051: 7(-0.9,-1.55) 8(-0.5,-1.55) 10(0.5,-1.55) 11(0.9,-1.55) 19(0.9,1.55) 20(0.5,1.55) 22(-0.5,1.55) 23(-0.9,1.55)
  rect 0.4x0.7 smd mask+0.051: 9(0,-1.55) 21(0,1.55)
  rect 1.9x1.9 smd mask+0.051: 25(0,0)
  silkscreen extent -2.26,-1.8 1.8,1.8, body extent -1.5,-1.5 1.5,1.5, height 1
R0402_0.40MM_HD [mm] "Resistor 0402 High Density"
  rect 0.35x0.45 smd: 1(-0.45,0) 2(0.45,0)
  body extent -0.5,-0.25 0.5,0.25, height 0.4
SOIC127P830X200-8L [mm] "SOIC, 8-Leads, Body 6.1x6.2mm (max), Pitch 1.27mm, IPC High Density"
  rect 1.8x0.6 smd: 1(-3.7,1.905) 2(-3.7,0.635) 3(-3.7,-0.635) 4(-3.7,-1.905) 5(3.7,-1.905) 6(3.7,-0.635) 7(3.7,0.635) 8(3.7,1.905)
  silkscreen extent -3.82,-3.05 2.4,3, body extent -4.2,-2.7 4.2,2.68, height 2.3
SOT23-5 [mm] "SOT23, 5-Leads, Body 3.1x2.6mm (max), Pitch 0.95mm, IPC High Density"
  rect 0.85x0.6 smd: 1(-1.125,0.95) 2(-1.125,0) 3(-1.125,-0.95) 4(1.125,-0.95) 5(1.125,0.95)
  silkscreen extent -1.15,-1.5 0.5,1.92, body extent -1.38,-1.45 1.32,1.45, height 1.15
SOT143B [mm] "SOT143B"
  rect 1.1x0.8 smd: 1(0,0)
  rect 0.6x0.7 smd: 2(1.702,0) 3(1.702,1.9) 4(-0.2,1.9)
  silkscreen extent -0.71,0.43 2.21,1.52, body extent -0.7,-0.27 2.22,2.15, height 1
"TC2030 NO LATCH" [mil] "TC2030  NO LATCH"
  round 31 smd paste-40: 1(-50,-25) 2(-50,25) 3(0,-25) 4(0,25) 5(50,-25) 6(50,25)
  round 34 hole 35 unplated: A(-100,0) B(100,40) C(100,-40)
  silkscreen extent -155,-90 125,90
VFBGA176 [mil]
  round 12 smd paste+0 mask+0: A1(-157.48,157.48) A2(-137.8,157.48) A3(-118.11,157.48) A5(-78.74,157.48) A7(-39.37,157.48) A9(0,157.48) A11(39.37,157.48) A13(78.74,157.48) A15(118.11,157.48) A16(137.8,157.48) A17(157.48,157.48) B1(-157.48,137.8) B2(-137.8,137.8) B3(-118.11,137.8) B5(-78.74,137.8) B6(-59.06,137.8) B7(-39.37,137.8) B9(0,137.8) B10(19.69,137.8) B11(39.37,137.8) B13(78.74,137.8) B14(98.43,137.8) B15(118.11,137.8) B16(137.8,137.8) B17(157.48,137.8) C1(-157.48,118.11) C2(-137.8,118.11) C3(-118.11,118.11) C4(-98.43,118.11) C5(-78.74,118.11) C7(-39.37,118.11) C9(0,118.11) C11(39.37,118.11) C13(78.74,118.11) C15(118.11,118.11) C16(137.8,118.11) C17(157.48,118.11) D2(-137.8,98.43) D5(-78.74,98.43) D6(-59.06,98.43) D7(-39.37,98.43) D8(-19.68,98.43) D9(0,98.43) D11(39.37,98.43) D12(59.06,98.43) D13(78.74,98.43) D15(118.11,98.43) E1(-157.48,78.74) E2(-137.8,78.74) E3(-118.11,78.74) E4(-98.43,78.74) E6(-59.06,78.74) E8(-19.68,78.74) E10(19.69,78.74) E12(59.06,78.74) E14(98.43,78.74) E15(118.11,78.74) E16(137.8,78.74) E17(157.48,78.74) F4(-98.43,59.06) F5(-78.74,59.06) F7(-39.37,59.06) F11(39.37,59.06) F13(78.74,59.06) F14(98.43,59.06) F16(137.8,59.06) G1(-157.48,39.37) G2(-137.8,39.37) G3(-118.11,39.37) G4(-98.43,39.37) G6(-59.06,39.37) G12(59.06,39.37) G14(98.43,39.37) G15(118.11,39.37) G16(137.8,39.37) G17(157.48,39.37) H2(-137.8,19.68) H5(-78.74,19.68) H8(-19.68,19.68) H9(0,19.68) H10(19.69,19.68) H13(78.74,19.68) H14(98.43,19.68) J1(-157.48,0) J2(-137.8,0) J3(-118.11,0) J4(-98.43,0) J8(-19.68,0) J10(19.69,0) J14(98.43,0) J15(118.11,0) J16(137.8,0) J17(157.48,0) K4(-98.43,-19.69) K5(-78.74,-19.69) K8(-19.68,-19.69) K9(0,-19.69) K10(19.69,-19.69) K13(78.74,-19.69) K16(137.8,-19.69) L1(-157.48,-39.37) L2(-137.8,-39.37) L3(-118.11,-39.37) L4(-98.43,-39.37) L6(-59.06,-39.37) L12(59.06,-39.37) L14(98.43,-39.37) L15(118.11,-39.37) L16(137.8,-39.37) L17(157.48,-39.37) M2(-137.8,-59.06) M4(-98.43,-59.06) M5(-78.74,-59.06) M7(-39.37,-59.06) M11(39.37,-59.06) M13(78.74,-59.06) M14(98.43,-59.06) N1(-157.48,-78.74) N2(-137.8,-78.74) N3(-118.11,-78.74) N4(-98.43,-78.74) N6(-59.06,-78.74) N8(-19.68,-78.74) N10(19.69,-78.74) N12(59.06,-78.74) N14(98.43,-78.74) N15(118.11,-78.74) N16(137.8,-78.74) N17(157.48,-78.74) P3(-118.11,-98.43) P5(-78.74,-98.43) P6(-59.06,-98.43) P7(-39.37,-98.43) P9(0,-98.43) P10(19.69,-98.43) P11(39.37,-98.43) P12(59.06,-98.43) P13(78.74,-98.43) P16(137.8,-98.43) R1(-157.48,-118.11) R2(-137.8,-118.11) R3(-118.11,-118.11) R5(-78.74,-118.11) R7(-39.37,-118.11) R9(0,-118.11) R11(39.37,-118.11) R13(78.74,-118.11) R14(98.43,-118.11) R15(118.11,-118.11) R16(137.8,-118.11) R17(157.48,-118.11) T1(-157.48,-137.8) T2(-137.8,-137.8) T3(-118.11,-137.8) T4(-98.43,-137.8) T5(-78.74,-137.8) T7(-39.37,-137.8) T8(-19.68,-137.8) T9(0,-137.8) T11(39.37,-137.8) T12(59.06,-137.8) T13(78.74,-137.8) T15(118.11,-137.8) T16(137.8,-137.8) T17(157.48,-137.8) U1(-157.48,-157.48) U2(-137.8,-157.48) U3(-118.11,-157.48) U5(-78.74,-157.48) U7(-39.37,-157.48) U9(0,-157.48) U11(39.37,-157.48) U13(78.74,-157.48) U15(118.11,-157.48) U16(137.8,-157.48) U17(157.48,-157.48)
  silkscreen extent -192,-177 177,189, body extent -177,-177 177,177, height 34
W25Q_XSON_8 [mm] "Winbond Flash 8 pin uSON"
  rect 0.584x0.3 smd mask+0.05: 1(-1.25,0.75) 2(-1.25,0.25) 3(-1.25,-0.25) 4(-1.25,-0.75) 5(1.25,-0.75) 6(1.25,-0.25) 7(1.25,0.25) 8(1.25,0.75)
  rect 0.25x1.56 smd: 9(0,0)
  silkscreen extent -1.9,-1.1 1.6,1.35, body extent -1.5,-1 1.5,1, height 0.6
XTAL-2.5x2.0mm [mm]
  rect 1.2x1 smd: 1(-0.85,-0.65) 2(0.85,-0.65) 3(0.85,0.65) 4(-0.85,0.65)
  silkscreen extent -1.75,-1.4 -1.65,-1.3, body extent -1.25,-1 1.25,1, height 0.6
XTAL_3215 [mm] "XTAL SMD 3.2 x 1.5 mm"
  rect 1x1.8 smd: 1(-1.25,0) 2(1.25,0)
  silkscreen extent -0.6,-0.75 0.6,0.75, body extent -1.6,-0.75 1.6,0.75, height 0.81

## Part data
C1 C5 C18: library part GCM188R70J225KE22D, "CAP CER 2.2UF 6.3V X7R 0603", jlc_pn=C126582, Manufacturer="Murata Electronics", Operating Temperature="-55°C ~ 125°C", Package=603, Ratings=AEC-Q200, Temperature Coefficient=X7R, Tolerance=±10%, Voltage - Rated=6.3V, cad-reference=GCM188R70J225KE22D, classification=capacitors/Murata_C0603, Id=019a404f-4691-7d07-43f1-8d708eb8f7ec, kicad-footprint=C0603_0.90MM_MD, kicad-footprint-path=footprints\C0603_0.90MM_MD.kicad_mod, kicad-symbol=C_2P_NP, kicad-symbol-path=symbols\C_2P_NP.kicad_sym, mpn=GCM188R70J225KE22D, Substitution Notes="2.2µF , 6.3V , ±10% , X7R , -55°C ~ 125°C , AEC-Q200 , 0603", Thickness (Max)=0.90MM
C2: library part GCJ188C70J475KE02D, "CAP CER 4.7UF 6.3V X7S 0603", Manufacturer="Murata Electronics", Operating Temperature="-55°C ~ 125°C", Package=0603, Ratings=AEC-Q200, Supplier Part Number 1=490-16480-1-ND, Temperature Coefficient=X7S, Tolerance=±10%, Voltage - Rated=6.3V, Category=Capacitors, ComponentLink1Description="Datasheet (Internal)", ComponentLink1URL=https://search.murata.co.jp/Ceramy/image/img/A01X/G101/ENG/GCJ188C70J475KE02-01.pdf, ComponentLink2Description="Datasheet (External)", ComponentLink2URL=https://search.murata.co.jp/Ceramy/image/img/A01X/G101/ENG/GCJ188C70J475KE02-01.pdf, Manufacturer Part Number=GCJ188C70J475KE02D, Substitution Notes="4.7µF , 6.3V , ±10% , X7S , -55°C ~ 125°C , AEC-Q200 , 0603", Supplier 1=Digikey, Thickness (Max)=1.00MM
C3: library part GRT155R61E474KE01D, "CAP CER 0.47UF 25V X5R 0402", Manufacturer="Murata Electronics", Operating Temperature="-55°C ~ 85°C", Package=0402, Ratings=AEC-Q200, Supplier Part Number 1=490-12269-1-ND, Temperature Coefficient=X5R, Tolerance=±10%, Voltage - Rated=25V, Category=Capacitors, ComponentLink1Description="Datasheet (Internal)", ComponentLink1URL=https://search.murata.co.jp/Ceramy/image/img/A01X/partnumbering_e_02.pdf, ComponentLink2Description="Datasheet (External)", ComponentLink2URL=https://search.murata.co.jp/Ceramy/image/img/A01X/partnumbering_e_02.pdf, Manufacturer Part Number=GRT155R61E474KE01D, Substitution Notes="0.47µF , 25V , ±10% , X5R , -55°C ~ 85°C , AEC-Q200 , 0402", Supplier 1=Digikey, Thickness (Max)=0.55MM
C4 C8 C10: library part GCM155C71A105KE38D, "CAP CER 1UF 10V X7S 0402", Manufacturer="Murata Electronics", Operating Temperature="-55°C ~ 125°C", Package=0402, Ratings=AEC-Q200, Supplier Part Number 1=490-13409-1-ND, Temperature Coefficient=X7S, Tolerance=±10%, Voltage - Rated=10V, Category=Capacitors, ComponentLink1Description="Datasheet (Internal)", ComponentLink1URL=https://www.murata.com/~/media/webrenewal/support/library/catalog/products/capacitor/mlcc/c03e.ashx?la=en-us, ComponentLink2Description="Datasheet (External)", ComponentLink2URL=https://www.murata.com/~/media/webrenewal/support/library/catalog/products/capacitor/mlcc/c03e.ashx?la=en-us, Manufacturer Part Number=GCM155C71A105KE38D, Substitution Notes="1µF , 10V , ±10% , X7S , -55°C ~ 125°C , AEC-Q200 , 0402", Supplier 1=Digikey, Thickness (Max)=0.55MM
C6 C12 C13 C14 C15 C16 C17 C20 C21 C22 C23 C24 C25 C26 C27 C28 C29 C30 C31 C32 C33 C34 C35 C36 C37 C38 C39 C40 C41: library part CC0201KRX5R5BB104, "Cap Ceramic 0.1uF 6.3VDC X5R 10% SMD 0201 Paper T/R", Capacitance=100nF, Case Code (Imperial)=0201, Case Code (Metric)=0603, Dielectric=X5R, Manufacturer=Yageo, Max Operating Temperature=85°C, Min Operating Temperature=-55°C, Package Quantity=1, Resistor Type=Ceramic, Supplier Part Number 1=311-1408-1-ND, Tolerance=10%, Voltage Rating=6.3V, Case/Package=0201, Category="Ceramic Capacitors", ComponentLink1Description=https://datasheet.ciiva.com/176/mlccorderingcode-176765.pdf?src-supplier=Digi-Key, ComponentLink1URL=https://datasheet.ciiva.com/176/mlccorderingcode-176765.pdf?src-supplier=Digi-Key, ComponentLink2Description=https://datasheet.ciiva.com/176/mlccorderingcode-176766.pdf?src-supplier=Digi-Key, ComponentLink2URL=https://datasheet.ciiva.com/176/mlccorderingcode-176766.pdf?src-supplier=Digi-Key, ComponentLink3Description=https://datasheet.ciiva.com/176/mlccorderingcode-176767.pdf?src-supplier=Digi-Key, ComponentLink3URL=https://datasheet.ciiva.com/176/mlccorderingcode-176767.pdf?src-supplier=Digi-Key, ComponentLink4Description=https://datasheet.ciiva.com/28450/1359354-28450200.pdf?src-supplier=Element14, ComponentLink4URL=https://datasheet.ciiva.com/28450/1359354-28450200.pdf?src-supplier=Element14, ComponentLink5Description=https://datasheet.ciiva.com/7656/1525783-7656597.pdf?src-supplier=Element14, ComponentLink5URL=https://datasheet.ciiva.com/7656/1525783-7656597.pdf?src-supplier=Element14, Depth=0.3mm, Halogen Free="Halogen Free", Height=0.3mm, Lead Free="Lead Free", Length=0.6mm, Manufacturer Part Number=CC0201KRX5R5BB104, Mount="Surface Mount", Number of Pins=2, Packaging="Tape and Reel", Pricing="1=0.10000, 10=0.02400, 50=0.01340, 100=0.01090, 500=0.00776, 1000=0.00610, 2500=0.00555, 5000=0.00510 (USD)", REACH SVHC="No SVHC", RoHS=Yes, RoHS Compliant=Yes, Series=CC, Stock=2999877, Supplier 1=Digi-Key, Termination=SMD/SMT, Thickness=0.013inch, Voltage Rating (DC)=6.3V, Width=0.3mm
C7 C9: library part GRT188R61A106ME13D, "CAP CER 10UF 10V X5R 0603", Manufacturer="Murata Electronics", Operating Temperature="-55°C ~ 85°C", Package=0603, Ratings=AEC-Q200, Supplier Part Number 1=490-12312-1-ND, Temperature Coefficient=X5R, Tolerance=±20%, Voltage - Rated=10V, Category=Capacitors, ComponentLink1Description="Datasheet (Internal)", ComponentLink1URL=https://search.murata.co.jp/Ceramy/image/img/A01X/G101/ENG/GRT188R61A106ME13-01.pdf, ComponentLink2Description="Datasheet (External)", ComponentLink2URL=https://search.murata.co.jp/Ceramy/image/img/A01X/G101/ENG/GRT188R61A106ME13-01.pdf, Manufacturer Part Number=GRT188R61A106ME13D, Substitution Notes="10µF , 10V , ±20% , X5R , -55°C ~ 85°C , AEC-Q200 , 0603", Supplier 1=Digikey, Thickness (Max)=0.90MM
C11 C19 C44 C45: library part GCM1555C1H8R0DA16D, "CAP CER 8PF 50V C0G/NP0 0402", Manufacturer="Murata Electronics", Operating Temperature="-55°C ~ 125°C", Package=402, Ratings=AEC-Q200, Supplier Part Number 1=490-13294-1-ND, Temperature Coefficient="C0G, NP0", Tolerance=±0.5pF, Voltage - Rated=50V, cad-reference=GCM1555C1H8R0DA16D, classification=capacitors/Murata_C0402, ComponentLink1Description="Datasheet (Internal)", ComponentLink1URL=https://www.murata.com/~/media/webrenewal/support/library/catalog/products/capacitor/mlcc/c03e.ashx?la=en-us, ComponentLink2Description="Datasheet (External)", ComponentLink2URL=https://www.murata.com/~/media/webrenewal/support/library/catalog/products/capacitor/mlcc/c03e.ashx?la=en-us, Id=019a404f-4218-7c53-d35c-d6453855ed4c, kicad-footprint=C0402_0.55MM_MD, kicad-footprint-path=footprints\C0402_0.55MM_MD.kicad_mod, kicad-symbol=C_2P_NP, kicad-symbol-path=symbols\C_2P_NP.kicad_sym, mpn=GCM1555C1H8R0DA16D, Substitution Notes="8pF , 50V , ±0.5pF , C0G, NP0 , -55°C ~ 125°C , AEC-Q200 , 0402", Supplier 1=Digikey, Thickness (Max)=0.55MM
C42 C43: library part CGA2B1X7R1C104K050BC, "CAP CER 0.1UF 16V X7R 0402", Manufacturer="TDK Corporation", Operating Temperature="-55°C ~ 125°C", Package=0402, Ratings=AEC-Q200, Supplier Part Number 1=445-5613-1-ND, Temperature Coefficient=X7R, Tolerance=±10%, Voltage - Rated=16V, Category=Capacitors, ComponentLink1Description="Datasheet (Internal)", ComponentLink1URL=datasheets\TDK\mlcc_automotive_general_en.pdf, ComponentLink2Description="Datasheet (External)", ComponentLink2URL=https://product.tdk.com/info/en/catalog/datasheets/mlcc_automotive_general_en.pdf, Features=-, Manufacturer Part Number=CGA2B1X7R1C104K050BC, Substitution Notes="0.1µF , 16V , ±10% , X7R , -55°C ~ 125°C , AEC-Q200 , 0402", Supplier 1=Digikey, Thickness (Max)=0.55MM
D1 D2: "DIODE SCHOTTKY 30V 1A SOD323", Capacitance @ Vr- F="25pF @ 5V- 1MHz", Current - Average Rectified (Io)=1A, Current - Reverse Leakage @ Vr="50µA @ 15V", Manufacturer="Diodes Inc", Package="SC-76- SOD-323", Supplier Device Package=SOD-323, Supplier Part Number 1=BAT760DICT-ND, Voltage - DC Reverse (Vr) (Max)=30V, Voltage - Forward (Vf) (Max) @ If="550mV @ 1A", Category=Diodes, CategorySort=400, ComponentLink1Description="Internal Datasheet", ComponentLink1URL=http://www.diodes.com/datasheets/ds30498.pdf, ComponentLink2Description="External Datasheet", ComponentLink2URL=http://www.diodes.com/datasheets/ds30498.pdf, Diode Suffix=1A_2C, Diode Type=Schottky, Manufacturer Part Number=BAT760-7, Mounting Type="Surface Mount", Num Pins=2, Packaging="Cut Tape (CT)", Reverse Recovery Time (trr)=-, SortValue=BAT760-7, Speed="Fast Recovery =< 500ns- > 200mA (Io)", Supplier 1=Digi-Key
D3: library part APT1608CGCK, Color=Green, Current - Test=20mA, Luminous Flux @ Current - Test=-, Manufacturer="Kingbright Corp", Millicandela Rating=50mcd, Package / Case="0603 (1608 Metric)", Supplier Part Number 1=754-1116-1-ND, Voltage - Forward (Vf) Typ=2.1V, Category=Optoelectronics, ComponentLink1Description=http://www.us.kingbright.com/images/catalog/SPEC/APT1608CGCK.pdf, ComponentLink1URL=http://www.us.kingbright.com/images/catalog/SPEC/APT1608CGCK.pdf, Height=0.75mm, Lens Style/Size="Rectangle with Flat Top, 1.2mm x 0.8mm", Lens Type=Clear, Manufacturer Part Number=APT1608CGCK, Mounting Type="Surface Mount", Packaging="Tape & Reel (TR)", Pricing 1="1=0.2, 10=0.153, 25=0.1224, 100=0.1105, 250=0.102, 500=0.0918 (USD)", RoHS="RoHS Compliant", Size / Dimension="1.60mm L x 0.80mm W", Stock 1=89450, Supplier 1=Digi-Key, Supplier 2=Digikey, Supplier Part Number 2=160-2162-1-ND, Viewing Angle=120°, Wavelength - Dominant=570nm, Wavelength - Peak=574nm
D4: library part APT1608SURCK, Color=Red, Current - Test=20mA, Luminous Flux @ Current - Test=-, Manufacturer="Kingbright Corp", Millicandela Rating=220mcd, Package / Case="0603 (1608 Metric)", Supplier Part Number 1=754-1123-1-ND, Voltage - Forward (Vf) Typ=1.95V, Category=Optoelectronics, ComponentLink1Description=http://www.us.kingbright.com/images/catalog/SPEC/APT1608SURCK.pdf, ComponentLink1URL=http://www.us.kingbright.com/images/catalog/SPEC/APT1608SURCK.pdf, Height=0.75mm, Lens Style/Size="Rectangle, 1.2mm x 0.8mm", Lens Type=Clear, Manufacturer Part Number=APT1608SURCK, Mounting Type="Surface Mount", Packaging="Cut Tape (CT)", Pricing 1="1=0.16, 10=0.116, 25=0.0932, 100=0.0853, 250=0.07752, 500=0.06976, 1000=0.062 (USD)", RoHS="RoHS Compliant", Size / Dimension="1.60mm L x 0.80mm W", Stock 1=92099, Supplier 1=Digi-Key, Viewing Angle=120°, Wavelength - Dominant=630nm, Wavelength - Peak=650nm
J1: "Tag Connect Pads - No latching Clips - ARM"
J2: "10P 1.27mm 3.4A 2 Surface Mount,Vertical -55℃~+125℃ SMD,P=1.27mm Headers, Male Pins ROHS", jlc_pn=C448647, Manufacturer=Samtec, cad-reference=FTSH-105-01-L-DV-K-TR, classification=connector/debug, Id=019a404f-3a14-73a5-034e-ae816e395ea1, kicad-footprint=FTSH-105-01-L-DV-K-TR, kicad-footprint-path=footprints\FTSH-105-01-L-DV-K-TR.kicad_mod, kicad-symbol=CORTEX-DEBUG, kicad-symbol-path=symbols\CORTEX-DEBUG.kicad_sym, mpn=FTSH-105-01-L-DV-K-TR
L2 L3: library part NRH3012T2R2MN, "Inductor 2.2µH 1.5A", Inductance (uH)=2.2, Manufacturer="Taiyo Yuden", Package=NRH3012, Rating=-, Sort Value=2.2_1.5, Sort Value Package=2.2_1.5_NRH3012, Supplier Part Number 1=587-2589-1-ND, Tolerance=±20%, Category=Inductors, CategorySort=300, ComponentLink1Description="External Datasheet", ComponentLink1URL=https://www.yuden.co.jp/productdata/catalog/en/wound04_e.pdf, DCR Max (Ohms)="90 mOhm Max", Height (mm)=1.2MM, IRMS=1.37, Isat (A)=1.5, Manufacturer Part Number=NRH3012T2R2MN, Part Number=NRH3012T2R2MN, Shielding=Sheilded, SRF typ (MHz)=78MHz, Supplier 1=Digikey, Supplier Unit Price 1=0.28
R1: library part ERJ-2RKF1002X, "RES 10K OHM 1/10W 1% 0402 SMD", Limiting Element Voltage=50, Manufacturer="Panasonic Electronic Components", Maximum Overload Voltage=100, Maximum Working Voltage=31.6V, Package="0402 (1005 Metric)", Package Power="0402  (0.1W)", Power (Watts)="0.1W- 1/10W", Ratings=AEC-Q200, Sort Value=10000, Sort Value Package=402_10000, Supplier Package=0402, Supplier Part Number 1=P10.0KLCT-ND, Temperature Coefficient=±100ppm/°C, Tolerance=±1%, Category=Resistors, ComponentLink1Description="Internal Datasheet", ComponentLink1URL="datasheets\Panasonic Electronic Components\AOA0000CE2.pdf", ComponentLink2Description="External Datasheet", ComponentLink2URL=http://industrial.panasonic.com/www-data/pdf/AOA0000/AOA0000CE2.pdf, Composition="Thick Film", Features=-, Height=0.40MM, Manufacturer Part Number=ERJ-2RKF1002X, Number of Terminations=2, Packaging="Cut Tape (CT)", Resistance (Ohms)=10k, Size / Dimension="0.039\" L x 0.020\" W (1.00mm x 0.50mm)", Substitution Notes="10k , ±1% , 0402 , AEC-Q200", Supplier 1=Digi-Key
R2 R5: library part ERJ-2RKF2002X, "RES 20K OHM 1/10W 1% 0402 SMD", Limiting Element Voltage=50, Manufacturer="Panasonic Electronic Components", Maximum Overload Voltage=100, Maximum Working Voltage=44.7V, Package="0402 (1005 Metric)", Package Power="0402  (0.1W)", Power (Watts)="0.1W- 1/10W", Ratings=AEC-Q200, Sort Value=20000, Sort Value Package=402_20000, Supplier Package=0402, Supplier Part Number 1=P20.0KLCT-ND, Temperature Coefficient=±100ppm/°C, Tolerance=±1%, Category=Resistors, ComponentLink1Description="Internal Datasheet", ComponentLink1URL="datasheets\Panasonic Electronic Components\AOA0000CE2.pdf", ComponentLink2Description="External Datasheet", ComponentLink2URL=http://industrial.panasonic.com/www-data/pdf/AOA0000/AOA0000CE2.pdf, Composition="Thick Film", Features=-, Height=0.40MM, Manufacturer Part Number=ERJ-2RKF2002X, Number of Terminations=2, Packaging="Cut Tape (CT)", Resistance (Ohms)=20k, Size / Dimension="0.039\" L x 0.020\" W (1.00mm x 0.50mm)", Substitution Notes="20k , ±1% , 0402 , AEC-Q200", Supplier 1=Digi-Key
R3 R4: library part ERJ-2RKF2201X, "RES 2.2K OHM 1/10W 1% 0402 SMD", Limiting Element Voltage=50, Manufacturer="Panasonic Electronic Components", Maximum Overload Voltage=100, Maximum Working Voltage=14.8V, Package="0402 (1005 Metric)", Package Power="0402  (0.1W)", Power (Watts)="0.1W- 1/10W", Ratings=AEC-Q200, Sort Value=2200, Sort Value Package=402_2200, Supplier Package=0402, Supplier Part Number 1=P2.20KLCT-ND, Temperature Coefficient=±100ppm/°C, Tolerance=±1%, Category=Resistors, ComponentLink1Description="Internal Datasheet", ComponentLink1URL="datasheets\Panasonic Electronic Components\AOA0000CE2.pdf", ComponentLink2Description="External Datasheet", ComponentLink2URL=http://industrial.panasonic.com/www-data/pdf/AOA0000/AOA0000CE2.pdf, Composition="Thick Film", Features=-, Height=0.40MM, Manufacturer Part Number=ERJ-2RKF2201X, Number of Terminations=2, Packaging="Cut Tape (CT)", Resistance (Ohms)=2.2k, Size / Dimension="0.039\" L x 0.020\" W (1.00mm x 0.50mm)", Substitution Notes="2.2k , ±1% , 0402 , AEC-Q200", Supplier 1=Digi-Key
R6 R7 R10 R21 R22 R23: library part ERJ-2GE0R00X, "RES 0.0 OHM 1/10W JUMP 0402 SMD", Limiting Element Voltage=50, Manufacturer="Panasonic Electronic Components", Maximum Overload Voltage=100, Maximum Working Voltage=0.0V, Package="0402 (1005 Metric)", Package Power="0402  (0.1W)", Power (Watts)="0.1W- 1/10W", Ratings=AEC-Q200, Sort Value Package=402_0, Supplier Package=0402, Supplier Part Number 1=P0.0JCT-ND, Temperature Coefficient=-, Tolerance=Jumper, Category=Resistors, ComponentLink1Description="Internal Datasheet", ComponentLink1URL="datasheets\Panasonic Electronic Components\AOA0000CE1.pdf", ComponentLink2Description="External Datasheet", ComponentLink2URL=http://industrial.panasonic.com/www-data/pdf/AOA0000/AOA0000CE1.pdf, Composition="Thick Film", Features=-, Height=0.40MM, Manufacturer Part Number=ERJ-2GE0R00X, Number of Terminations=2, Resistance (Ohms)=0, Size / Dimension="0.039\" L x 0.020\" W (1.00mm x 0.50mm)", Sort Value=0, Substitution Notes="0 , Jumper , 0402 , AEC-Q200", Supplier 1=Digi-Key
R8 R12 R13 R14 R15 R17 R18: library part ERJ-2RKF1003X, "RES 100K OHM 1/10W 1% 0402 SMD", Limiting Element Voltage=50, Manufacturer="Panasonic Electronic Components", Maximum Overload Voltage=100, Maximum Working Voltage=50.0V, Package="0402 (1005 Metric)", Package Power="0402  (0.1W)", Power (Watts)="0.1W- 1/10W", Ratings=AEC-Q200, Sort Value=100000, Sort Value Package=402_100000, Supplier Package=0402, Supplier Part Number 1=P100KLCT-ND, Temperature Coefficient=±100ppm/°C, Tolerance=±1%, Category=Resistors, ComponentLink1Description="Internal Datasheet", ComponentLink1URL="datasheets\Panasonic Electronic Components\AOA0000CE2.pdf", ComponentLink2Description="External Datasheet", ComponentLink2URL=http://industrial.panasonic.com/www-data/pdf/AOA0000/AOA0000CE2.pdf, Composition="Thick Film", Features=-, Height=0.40MM, Manufacturer Part Number=ERJ-2RKF1003X, Number of Terminations=2, Packaging="Cut Tape (CT)", Resistance (Ohms)=100k, Size / Dimension="0.039\" L x 0.020\" W (1.00mm x 0.50mm)", Substitution Notes="100k , ±1% , 0402 , AEC-Q200", Supplier 1=Digi-Key
R16 R19 R20: library part ERJ-2RKF1001X, "RES 1K OHM 1/10W 1% 0402 SMD", Limiting Element Voltage=50, Manufacturer="Panasonic Electronic Components", Maximum Overload Voltage=100, Maximum Working Voltage=10.0V, Package="0402 (1005 Metric)", Package Power="0402  (0.1W)", Power (Watts)="0.1W- 1/10W", Ratings=AEC-Q200, Sort Value=1000, Sort Value Package=402_1000, Supplier Package=0402, Supplier Part Number 1=P1.00KLCT-ND, Temperature Coefficient=±100ppm/°C, Tolerance=±1%, Category=Resistors, ComponentLink1Description="Internal Datasheet", ComponentLink1URL="datasheets\Panasonic Electronic Components\AOA0000CE2.pdf", ComponentLink2Description="External Datasheet", ComponentLink2URL=http://industrial.panasonic.com/www-data/pdf/AOA0000/AOA0000CE2.pdf, Composition="Thick Film", Features=-, Height=0.40MM, Manufacturer Part Number=ERJ-2RKF1001X, Number of Terminations=2, Packaging="Cut Tape (CT)", Resistance (Ohms)=1k, Size / Dimension="0.039\" L x 0.020\" W (1.00mm x 0.50mm)", Substitution Notes="1k , ±1% , 0402 , AEC-Q200", Supplier 1=Digi-Key
U1: "SOC i.MX ARM Cortex M33 176-Pin VFBGA Tray", Manufacturer="NXP Semiconductors", Package=None, Availability=Warning, Check_prices=https://www.snapeda.com/parts/MIMXRT633SFVKB/Nexperia/view-part/5163781/?ref=eda, Manufacturer Part Number=MIMXRT685SFVKB, Price=None, Purchase-URL=https://pricing.snapeda.com/search/part/MIMXRT633SFVKB/?ref=eda, SnapEDA_Link=https://www.snapeda.com/parts/MIMXRT633SFVKB/Nexperia/view-part/5163781/?ref=snap
U2: "Power Management IC for Low-Power Microcontroller Applications 24-Pin HVQFN", Manufacturer="NXP Semiconductors", Supplier Part Number 1=771-PCA9420BSAZ, Check_prices=https://www.snapeda.com/parts/PCA9420BSAZ/NXP%20Semiconductors/view-part/5003095/?ref=eda, Manufacturer Part Number=PCA9420BSAZ, Pricing="1=3.09000, 10=2.78000, 50=2.63000, 100=2.28000, 1000=2.23000, 10000=2.20000 (USD)", RoHS=Yes, RoHS Compliant=Yes, SnapEDA_Link=https://www.snapeda.com/parts/PCA9420BSAZ/NXP%20Semiconductors/view-part/5003095/?ref=snap, Stock=953, Supplier 1=Mouser
U3: "IC BUFF NON-INVERT 2.7 V SOT23-5", Case/Package=SOT-23-5, High Level Output Current=9mA, Manufacturer="Texas Instruments", Max Operating Temperature=85°C, Max Supply Voltage=2.7V, Min Operating Temperature=-40°C, Min Supply Voltage=800mV, Package Quantity=3000, Quiescent Current=10uA, Supplier Part Number 1=296-12463-1-ND, Category="Buffers, Drivers and Transceivers", ComponentLink1Description=https://datasheet.ciiva.com/1833/sn74auc1g07-1833760.pdf?src-supplier=Digi-Key, ComponentLink1URL=https://datasheet.ciiva.com/1833/sn74auc1g07-1833760.pdf?src-supplier=Digi-Key, ComponentLink2Description=https://datasheet.ciiva.com/14302/sces373q-14302179.pdf?src-supplier=Avnet, ComponentLink2URL=https://datasheet.ciiva.com/14302/sces373q-14302179.pdf?src-supplier=Avnet, ComponentLink3Description=https://datasheet.ciiva.com/15094/getdatasheetpartid-69632-15094449.pdf?src-supplier=Verical, ComponentLink3URL=https://datasheet.ciiva.com/15094/getdatasheetpartid-69632-15094449.pdf?src-supplier=Verical, ComponentLink4Description=https://datasheet.ciiva.com/1833/sn74auc1g07-1833761.pdf?src-supplier=Digi-Key, ComponentLink4URL=https://datasheet.ciiva.com/1833/sn74auc1g07-1833761.pdf?src-supplier=Digi-Key, ComponentLink5Description=https://datasheet.ciiva.com/1833/sn74auc1g07-1833762.pdf?src-supplier=Digi-Key, ComponentLink5URL=https://datasheet.ciiva.com/1833/sn74auc1g07-1833762.pdf?src-supplier=Digi-Key, ComponentLink6Description=https://datasheet.ciiva.com/14302/sces373q-14302175.pdf?src-supplier=Avnet, ComponentLink6URL=https://datasheet.ciiva.com/14302/sces373q-14302175.pdf?src-supplier=Avnet, Lead Free="Lead Free", Logic Function=Buffer,Inverting, Low Level Output Current=9mA, Manufacturer Part Number=SN74AUC1G07DBVR, Mount="Surface Mount", Number of Bits=1, Number of Bits per Element=1, Number of Channels=1, Number of Elements=1, Number of Gates=1, Number of Input Lines=1, Number of Inputs=1, Number of Output Lines=1, Number of Outputs=1, Number of Pins=5, Packaging="Tape and Reel", Polarity=Non-Inverting, Pricing="1=0.41000, 10=0.32900, 25=0.30080, 100=0.22390, 250=0.20288, 500=0.16790, 1000=0.12593 (USD)", Propagation Delay=1.7ns, Radiation Hardening=No, REACH SVHC=Unknown, RoHS=Yes, RoHS Compliant=Yes, Series=74AUC, Stock=6487, Supplier 1=Digi-Key, Technology=CMOS, Turn-On Delay Time=3.3ns
U4: "TVS DIODE 5.5VWM SOT143B", Capacitance @ Frequency="1pF @ 1MHz", Current - Peak Pulse (10/1000µs)=-, Manufacturer="NXP Semiconductors", Operating Temperature="-40°C ~ 85°C (TA)", Package / Case="TO-253-4, TO-253AA", Power Line Protection=Yes, Supplier Device Package=SOT-143B, Supplier Part Number 1=568-4140-1-ND, Voltage - Breakdown (Min)=6V, Voltage - Reverse Standoff (Typ)="5.5V (Max)", Applications="General Purpose", Bidirectional Channels=2, Category="Circuit Protection", ComponentLink1Description=http://www.nxp.com/documents/data_sheet/PRTR5V0U2X.pdf, ComponentLink1URL=http://www.nxp.com/documents/data_sheet/PRTR5V0U2X.pdf, Manufacturer Part Number=PRTR5V0U2X,215, Mounting Type="Surface Mount", Packaging="Cut Tape (CT)", Power - Peak Pulse=-, Pricing="1=0.57, 10=0.477, 25=0.418, 100=0.3578, 250=0.31036, 500=0.26286, 1000=0.20265 (USD)", RoHS="RoHS Compliant", Stock=11734, Supplier 1=Digi-Key, Type="Steering (Rail to Rail)", Unidirectional Channels=-, Voltage - Clamping (Max) @ Ipp=-
U5: "16Mbit 1.65V~1.95V 133MHz SPI XSON-8-EP(2x3) Memory (ICs) ROHS", JLCPCB Part #=C2835333, Manufacturer=Winbond, cad-reference=W25Q16JWXHIQ, Category=ic, kicad-footprint=W25Q_XSON_8, kicad-footprint-path=footprints\ic\W25Q_XSON_8.kicad_mod, kicad-symbol=W25QXX-USON, kicad-symbol-path=symbols\ic\flash-memory\W25QXX-USON.kicad_sym, Manufacturer Part Number=W25Q16JWXHIQ, table=flash_memory
U6: library part W25Q64JWSSIQ, "64Mbit 1V8 SOIC-8-208mil NOR FLASH ROHS", jlc_pn=C2895586, Manufacturer=Winbond, cad-reference=W25Q64JWSSIQ, classification=ic/flash_memory, Id=019cf8db-ceaa-7e46-b4d4-a7dc12e95b9b, kicad-footprint=SOIC127P830X200-8L, kicad-footprint-path=footprints\SOIC127P830X200-8L.kicad_mod, kicad-symbol=W25Q, kicad-symbol-path=symbols\W25Q.kicad_sym, mpn=W25Q64JWSSIQ
X1: library part NX3215SA-32.768K-STD-MUA-9, "CRYSTAL 32.768KHZ 9PF SMD", Case/Package=SMD/SMT, ESR (Equivalent Series Resistance)=70kR, Frequency Tolerance=20ppm, Load Capacitance=9pF, Manufacturer=NDK, Max Operating Temperature=85°C, Min Operating Temperature=-40°C, Package Quantity=1000, Supplier Part Number 1=644-1155-6-ND, Frequency=32.768kHz, Height=0.035inch, Lead Free="Lead Free", Length=0.126inch, Manufacturer Part Number=NX3215SA-32.768K-STD-MUA-9, Mount="Surface Mount", Number of Pins=2, Packaging="Tape and Reel", Pricing 1="1=0.68, 10=0.602, 50=0.5628, 100=0.4974, 500=0.47124, 1000=0.3927 (USD)", Stock 1=39338, Supplier 1=Digi-Key, Width=0.059inch
X2: library part ECS-240-8-36CKM-TR, "8pF SMD2520-4P Crystals ROHS", jlc_pn=C435195, Manufacturer=ECS, cad-reference=ECS-240-8-36CKM-TR, classification=crystal_osc/smt, Id=019a404e-952d-7e39-c884-6e495835a3c8, kicad-footprint=XTAL-2.5x2.0mm, kicad-footprint-path=footprints\XTAL-2.5x2.0mm.kicad_mod, kicad-symbol=CRYSTAL_4P--1-3-GND-2-4, kicad-symbol-path=symbols\CRYSTAL_4P--1-3-GND-2-4.kicad_sym, mpn=ECS-240-8-36CKM-TR

## Free pads (board coordinates)
  rect 170x170 hole 70: 2(100,100) 2(100,1350) 2(1350,100) 2(1350,1350)

## Via types
v1: diameter 18, hole 8, Top Layer to Bottom Layer, tented both sides, 116 vias
v2: diameter 12, hole 6, Top Layer to Bottom Layer, tented both sides, 91 vias

## Nets (pads, with @x,y where several pads share a name; then routed paths per layer and width w, separated by ;. In a path a pad name is that pad's centre, name@x,y a point inside that pad or via, vN(x,y) a via of type N, cw(c..) or ccw(c..) an arc to the next point about the centre after c; other vN are vias at no path point)
+1v8: C36.2 C37.2 C38.2 C39.2 C40.2 C41.2 R10.2 R21.1 R23.1 U1.A13 U1.B11 U1.C4 U1.C16 U1.C17 U1.E4 U1.E15 U1.F13 U1.G14 U1.L4 U1.R15 | length 1657
  Top Layer w10: v2(361.57,818.74) v2(361.57,858.11) ; v2(538.74,799.06) 538.74,786.18 545.17,779.75 558.04,779.75 U1.G14@558.43,779.37 ; U1.R15@578.11,623.61 v2(578.11,641.57) ; v2(597.8,858.11) v2(617.48,858.11) ; R23.1@656,1176.72 656.09,1176.62 681.91,1176.62 R10.2@682.31,1176.22 ; v1(682,1136) v1(682,1156) 682.31,1156.31 R10.2@682.31,1176.22 ; R10.2@682.62,1176.53 R10.2@682.31,1176.22
  PWR4 w10: 298,717 355.1,717 361.96,710.14 361.96,701.01 v2(361.57,700.63) v2@361.19,701.01 ; v2(361.57,858.11) v2(361.57,818.74) 361.57,792.43 375,779 518.69,779 v2(538.74,799.06) 539,799.31 539,837.18 536.77,839.41 ; 534.16,581 577.73,624.57 577.73,641.19 v2(578.11,641.57) 578.11,674.11 587,683 618.14,683 624,688.86 624,772.85 v2(578.11,818.74) 578.11,838.43 579.09,839.41 ; v2(538.74,897.48) 504.86,897.48 499.75,892.38 499.75,878.18 v2(499.37,877.8) 499.75,877.41 499.75,862.65 522.99,839.41 536.77,839.41 ; v2(617.48,858.11) v2(597.8,858.11) 597.8,845.27 591.94,839.41 579.09,839.41 ; 536.77,839.41 579.09,839.41
  Bottom Layer w10: R21.1@260,873.43 260.22,873.22 278.78,873.22 v1(279,873) 279,875.16 302.46,898.62 348.03,898.62 353.89,892.76 C38.2@353.89,881.73 ; C38.2@353.89,879.92 361.19,872.62 361.19,858.49 v2(361.57,858.11) 361.57,857.57 359.49,855.48 359.49,840.08 C39.2@359.41,840 ; v2@361.03,700.63 v2(361.57,700.63) 361.92,700.97 361.92,721.08 C40.2@362,721.16 ; v2@499.47,877.89 v2(499.37,877.8) 499.37,899.1 499.45,899.18 C36.2@499.57,899.18 ; C41.2@538,819 538,800.34 538.74,799.6 v2(538.74,799.06) ; C37.2@538,912.06 C37.2@538.3,912.06 ; v2@539,897.74 538.38,898.35 538.38,911.98 C37.2@538.3,912.06 ; v1(682,1156) 682,1109.57 567,994.57 567,923.37 555.68,912.06 C37.2@538.3,912.06
+1v8-AO: C10.2 R2.2 R5.2 U1.C13 U1.D13 U2.12 U3.5 | length 1152.2
  Top Layer w5: U1.D13@538.74,838.43 v2(538.74,858.11)